# Altium PCB EB1_Spartan_III_1_02.PcbDoc (part 1 of 4)
Units mm, origin at the board's own origin, x right, y up, seen from the top; angles counter-clockwise.
Board outline 165.1 x 115.01 mm, 6 copper layers (Top Layer, MidLayer1, VCC Plane, GND Plane, MidLayer2, Bottom Layer); 356 components, 386 nets, 1788 pads, 779 vias.
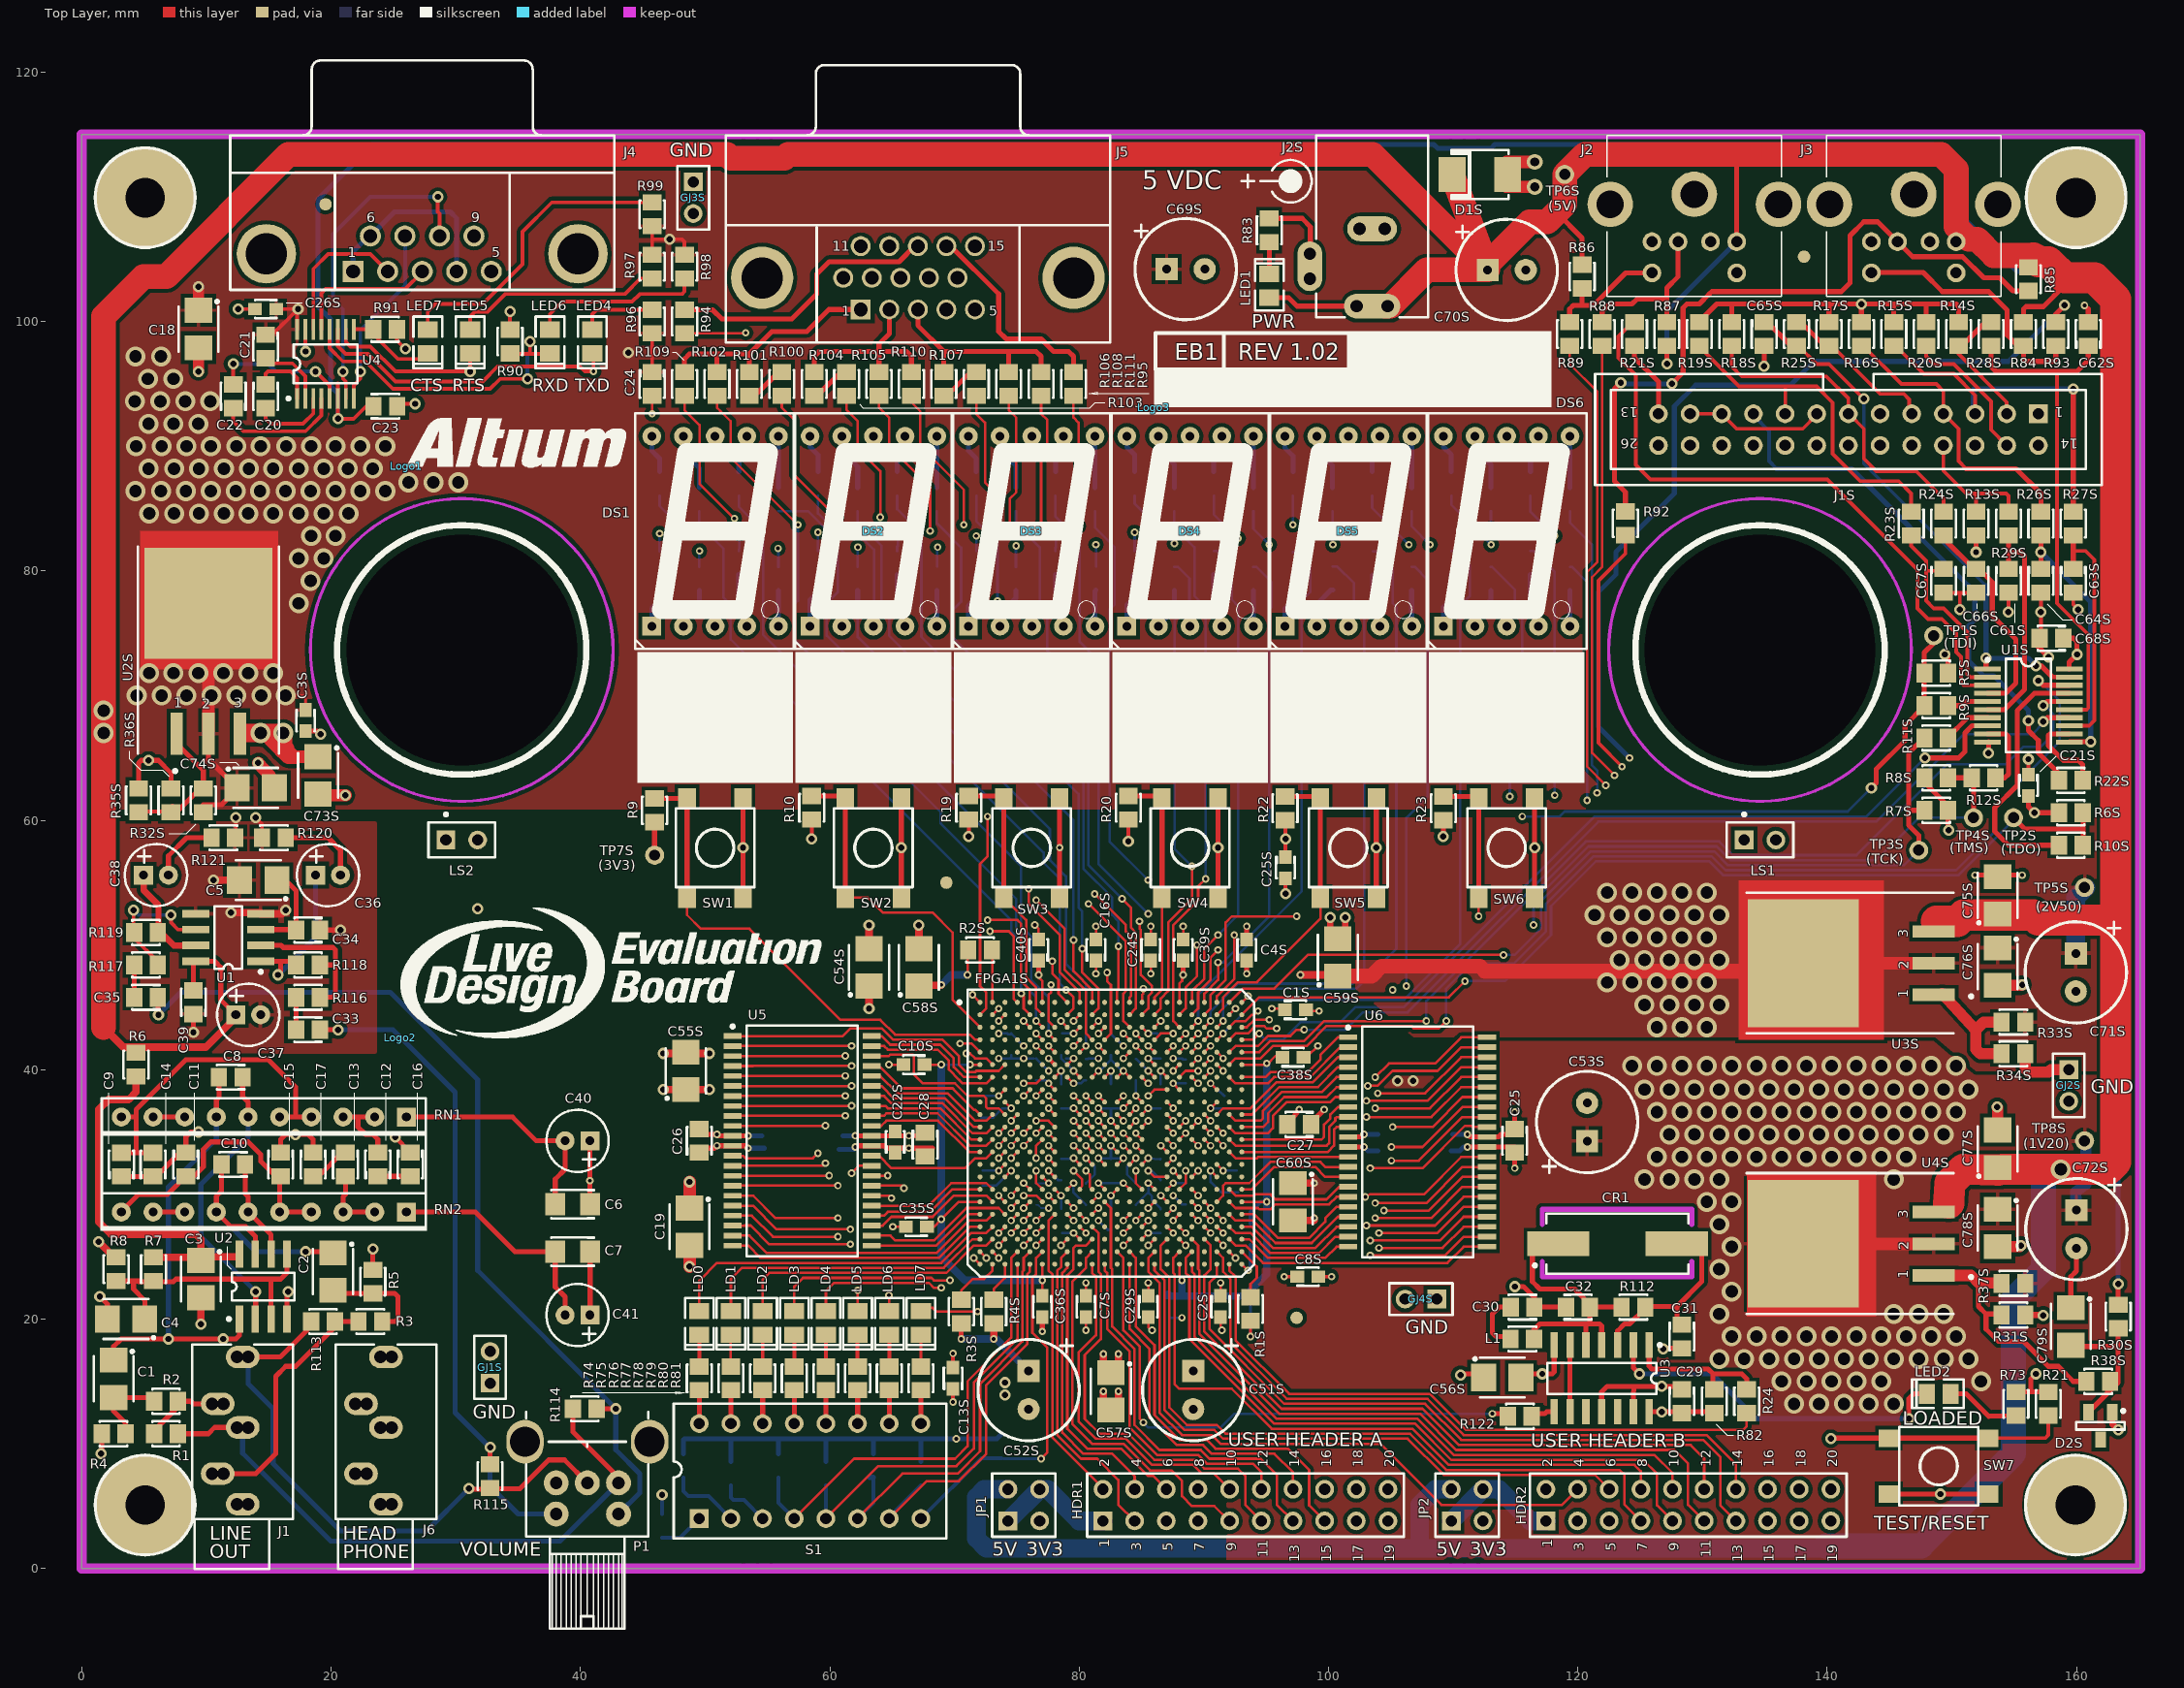
[diagram p0: Top Layer view]
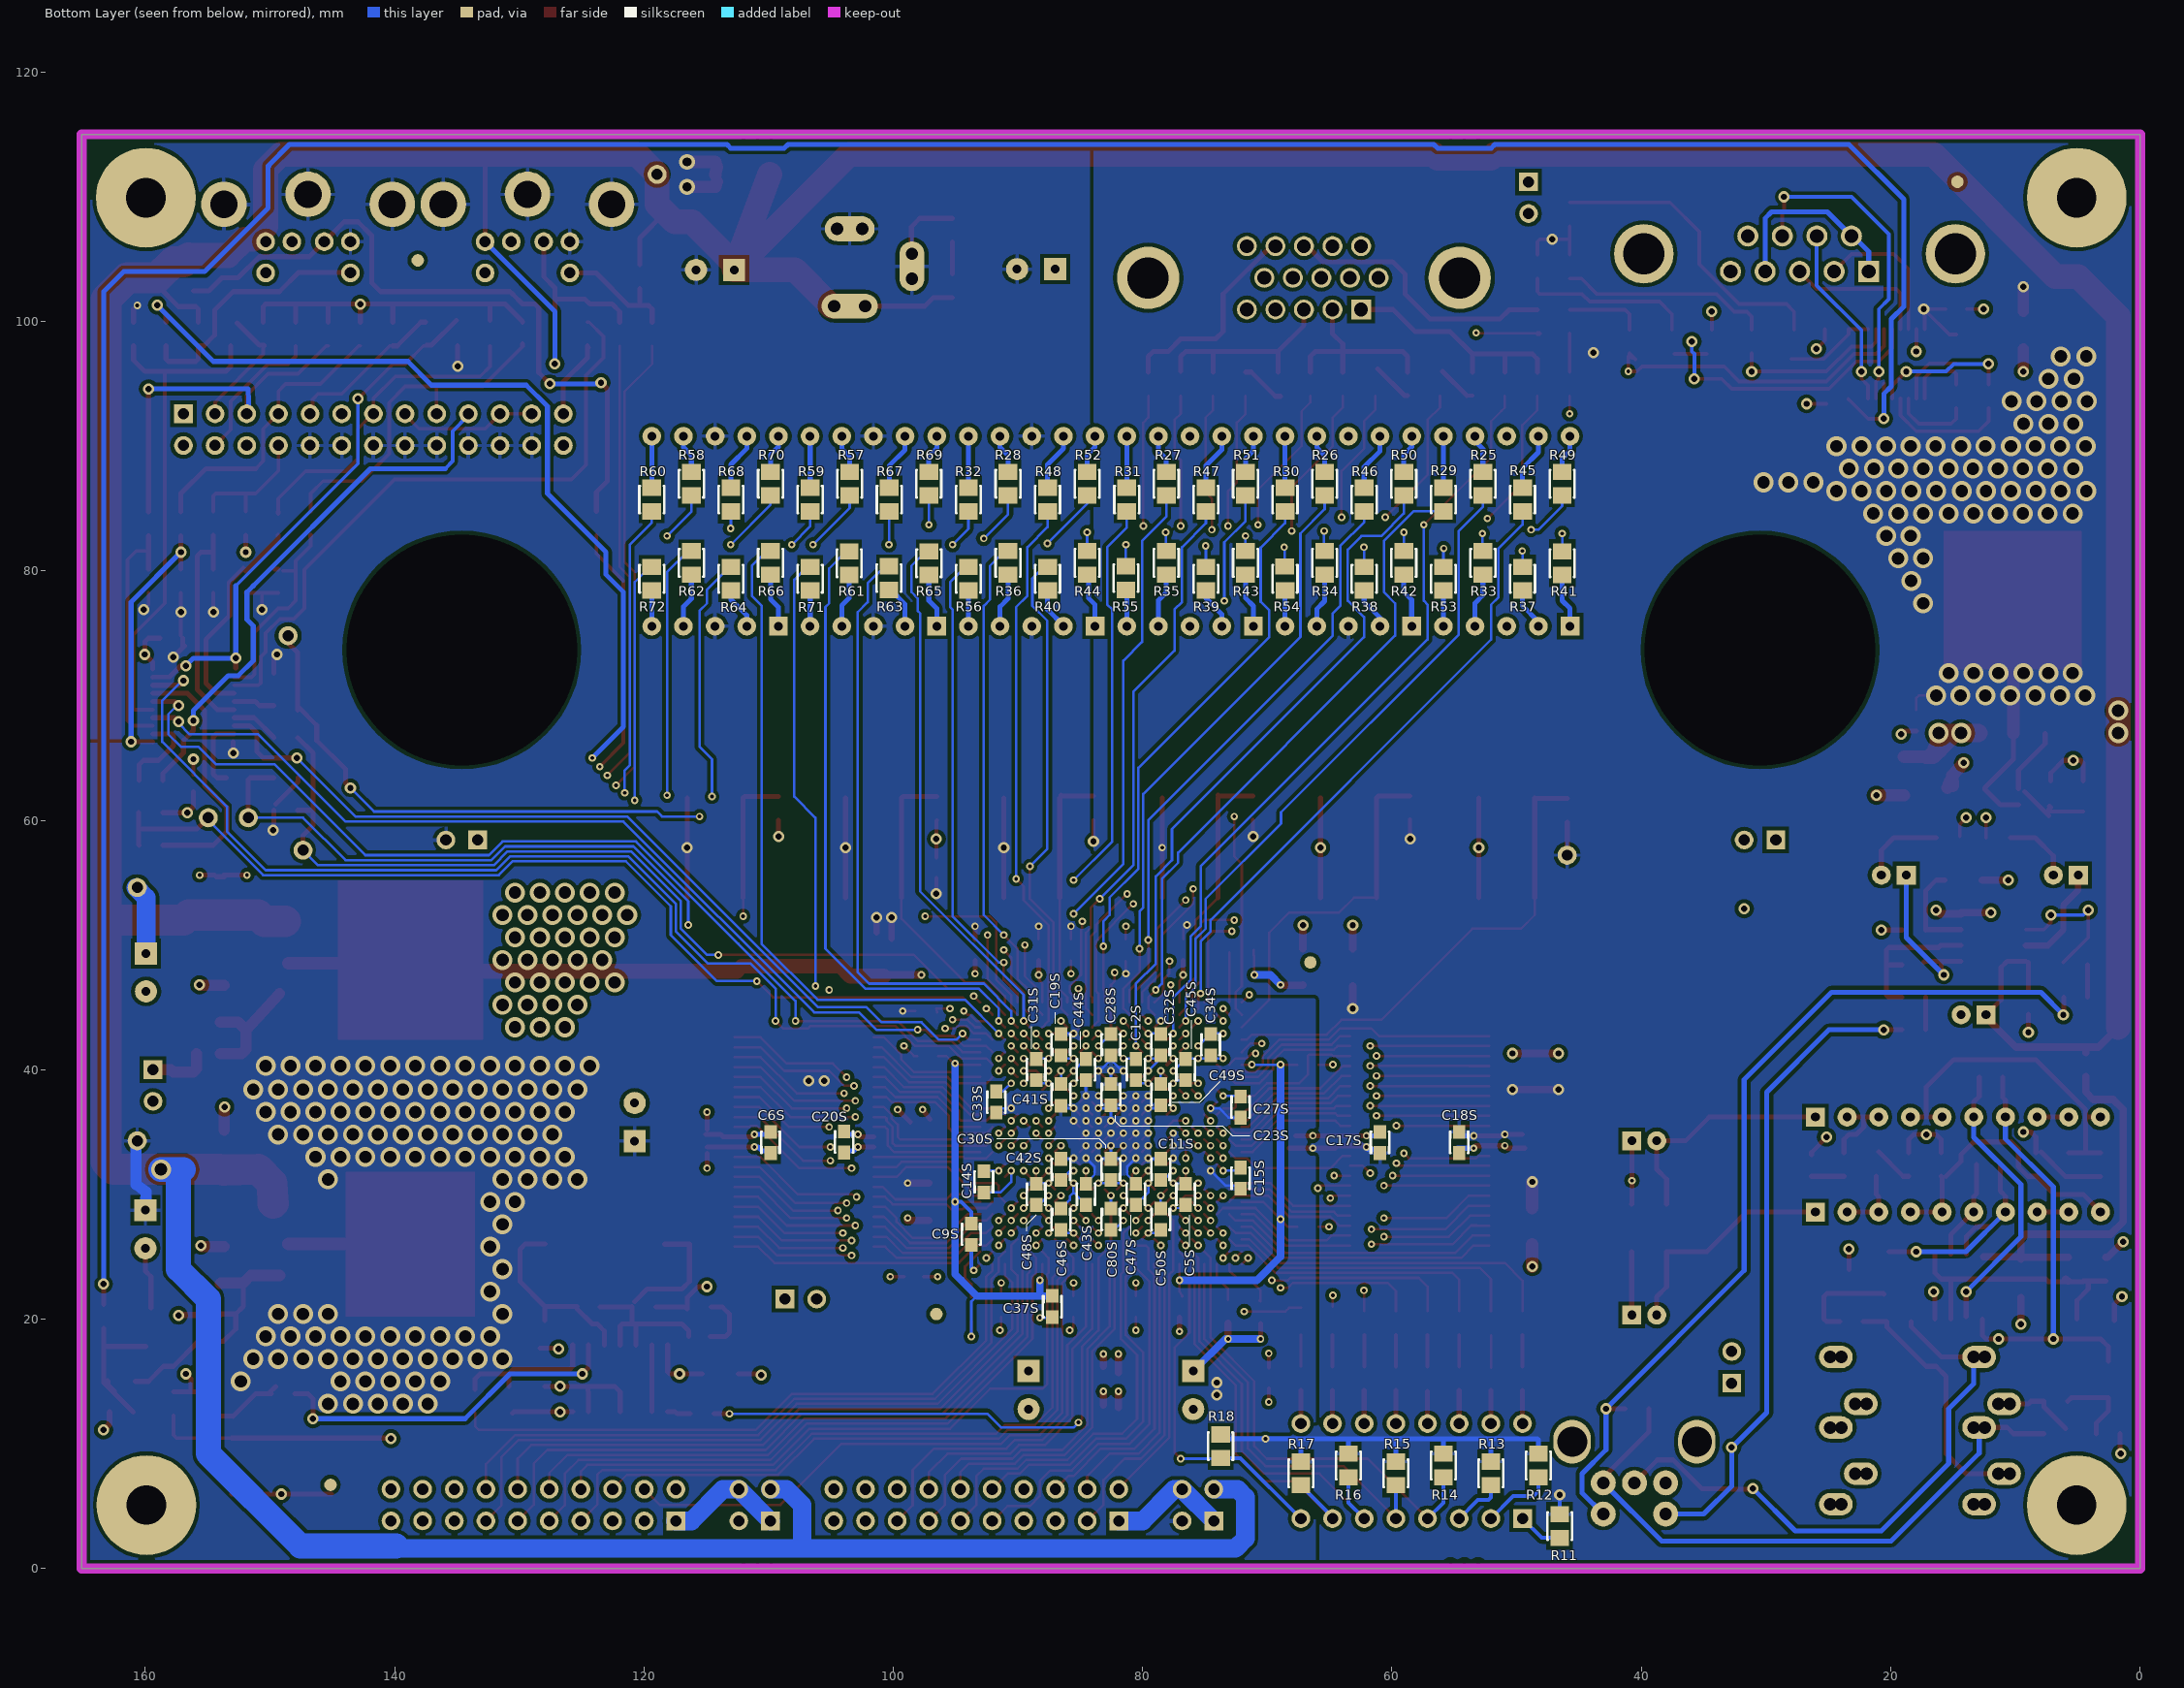
[diagram p1: Bottom Layer view, seen from below]
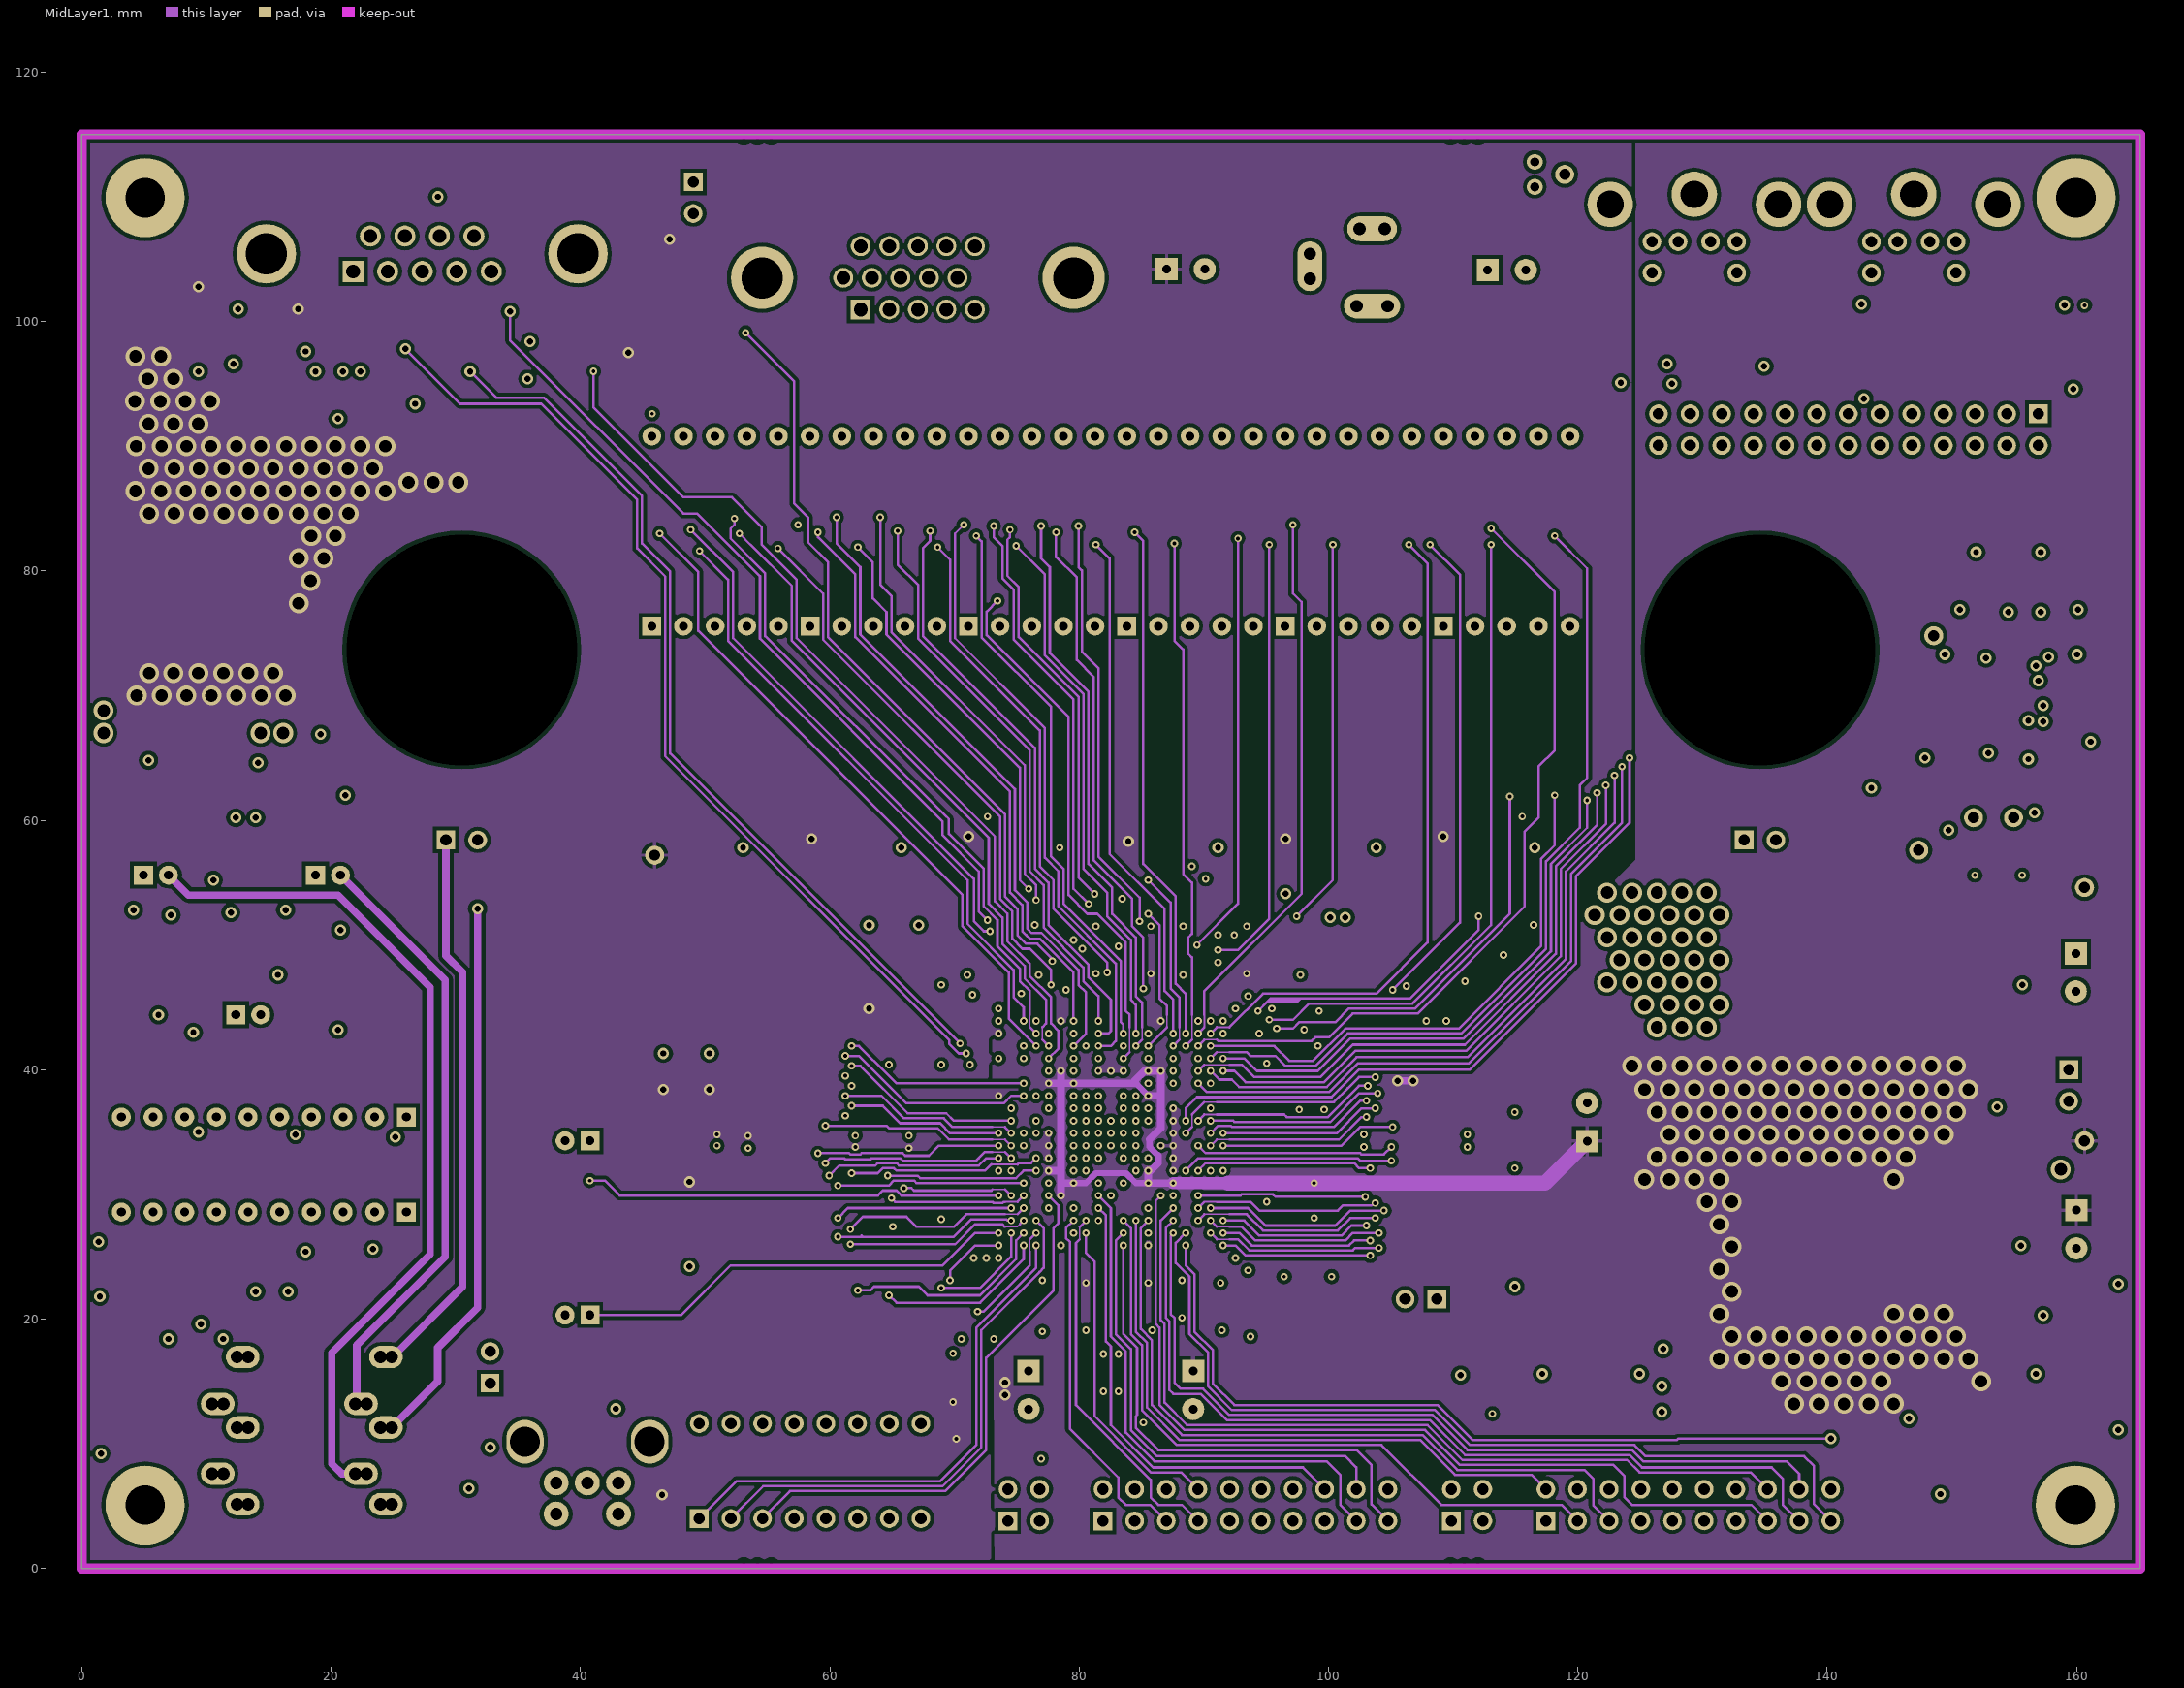
[diagram p2: MidLayer1]
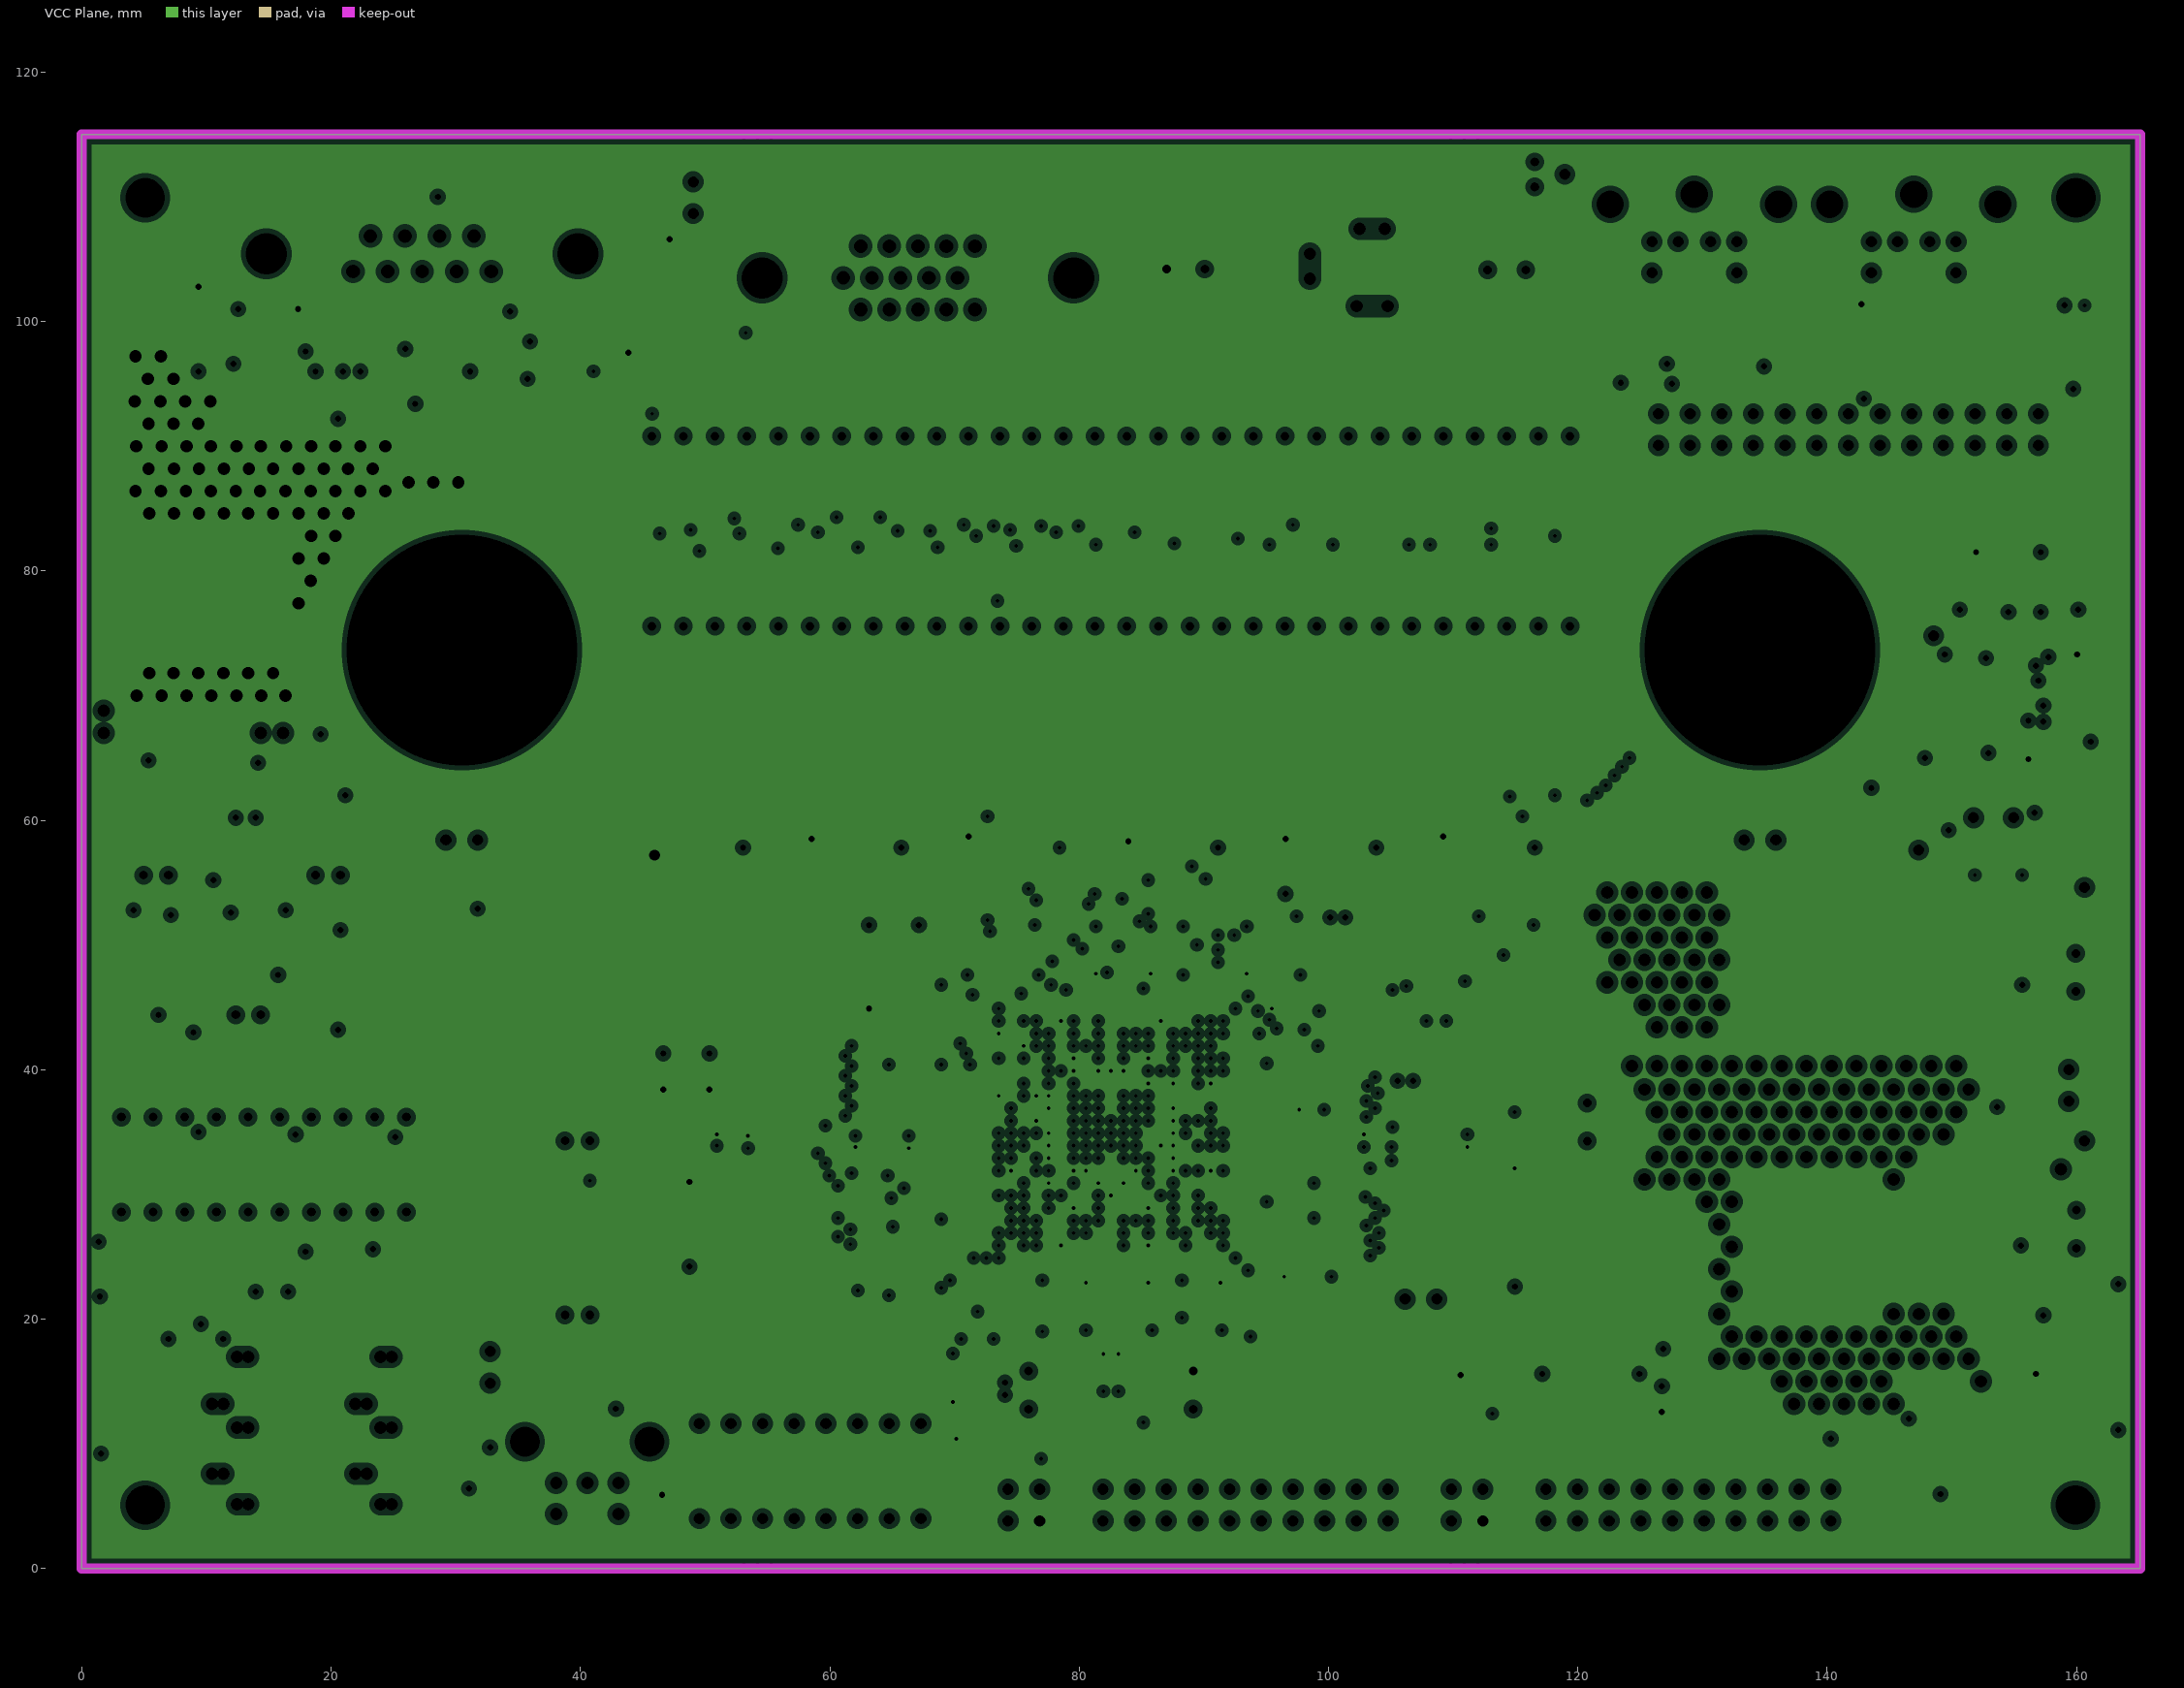
[diagram p3: VCC Plane, clearances drawn from the general rule]
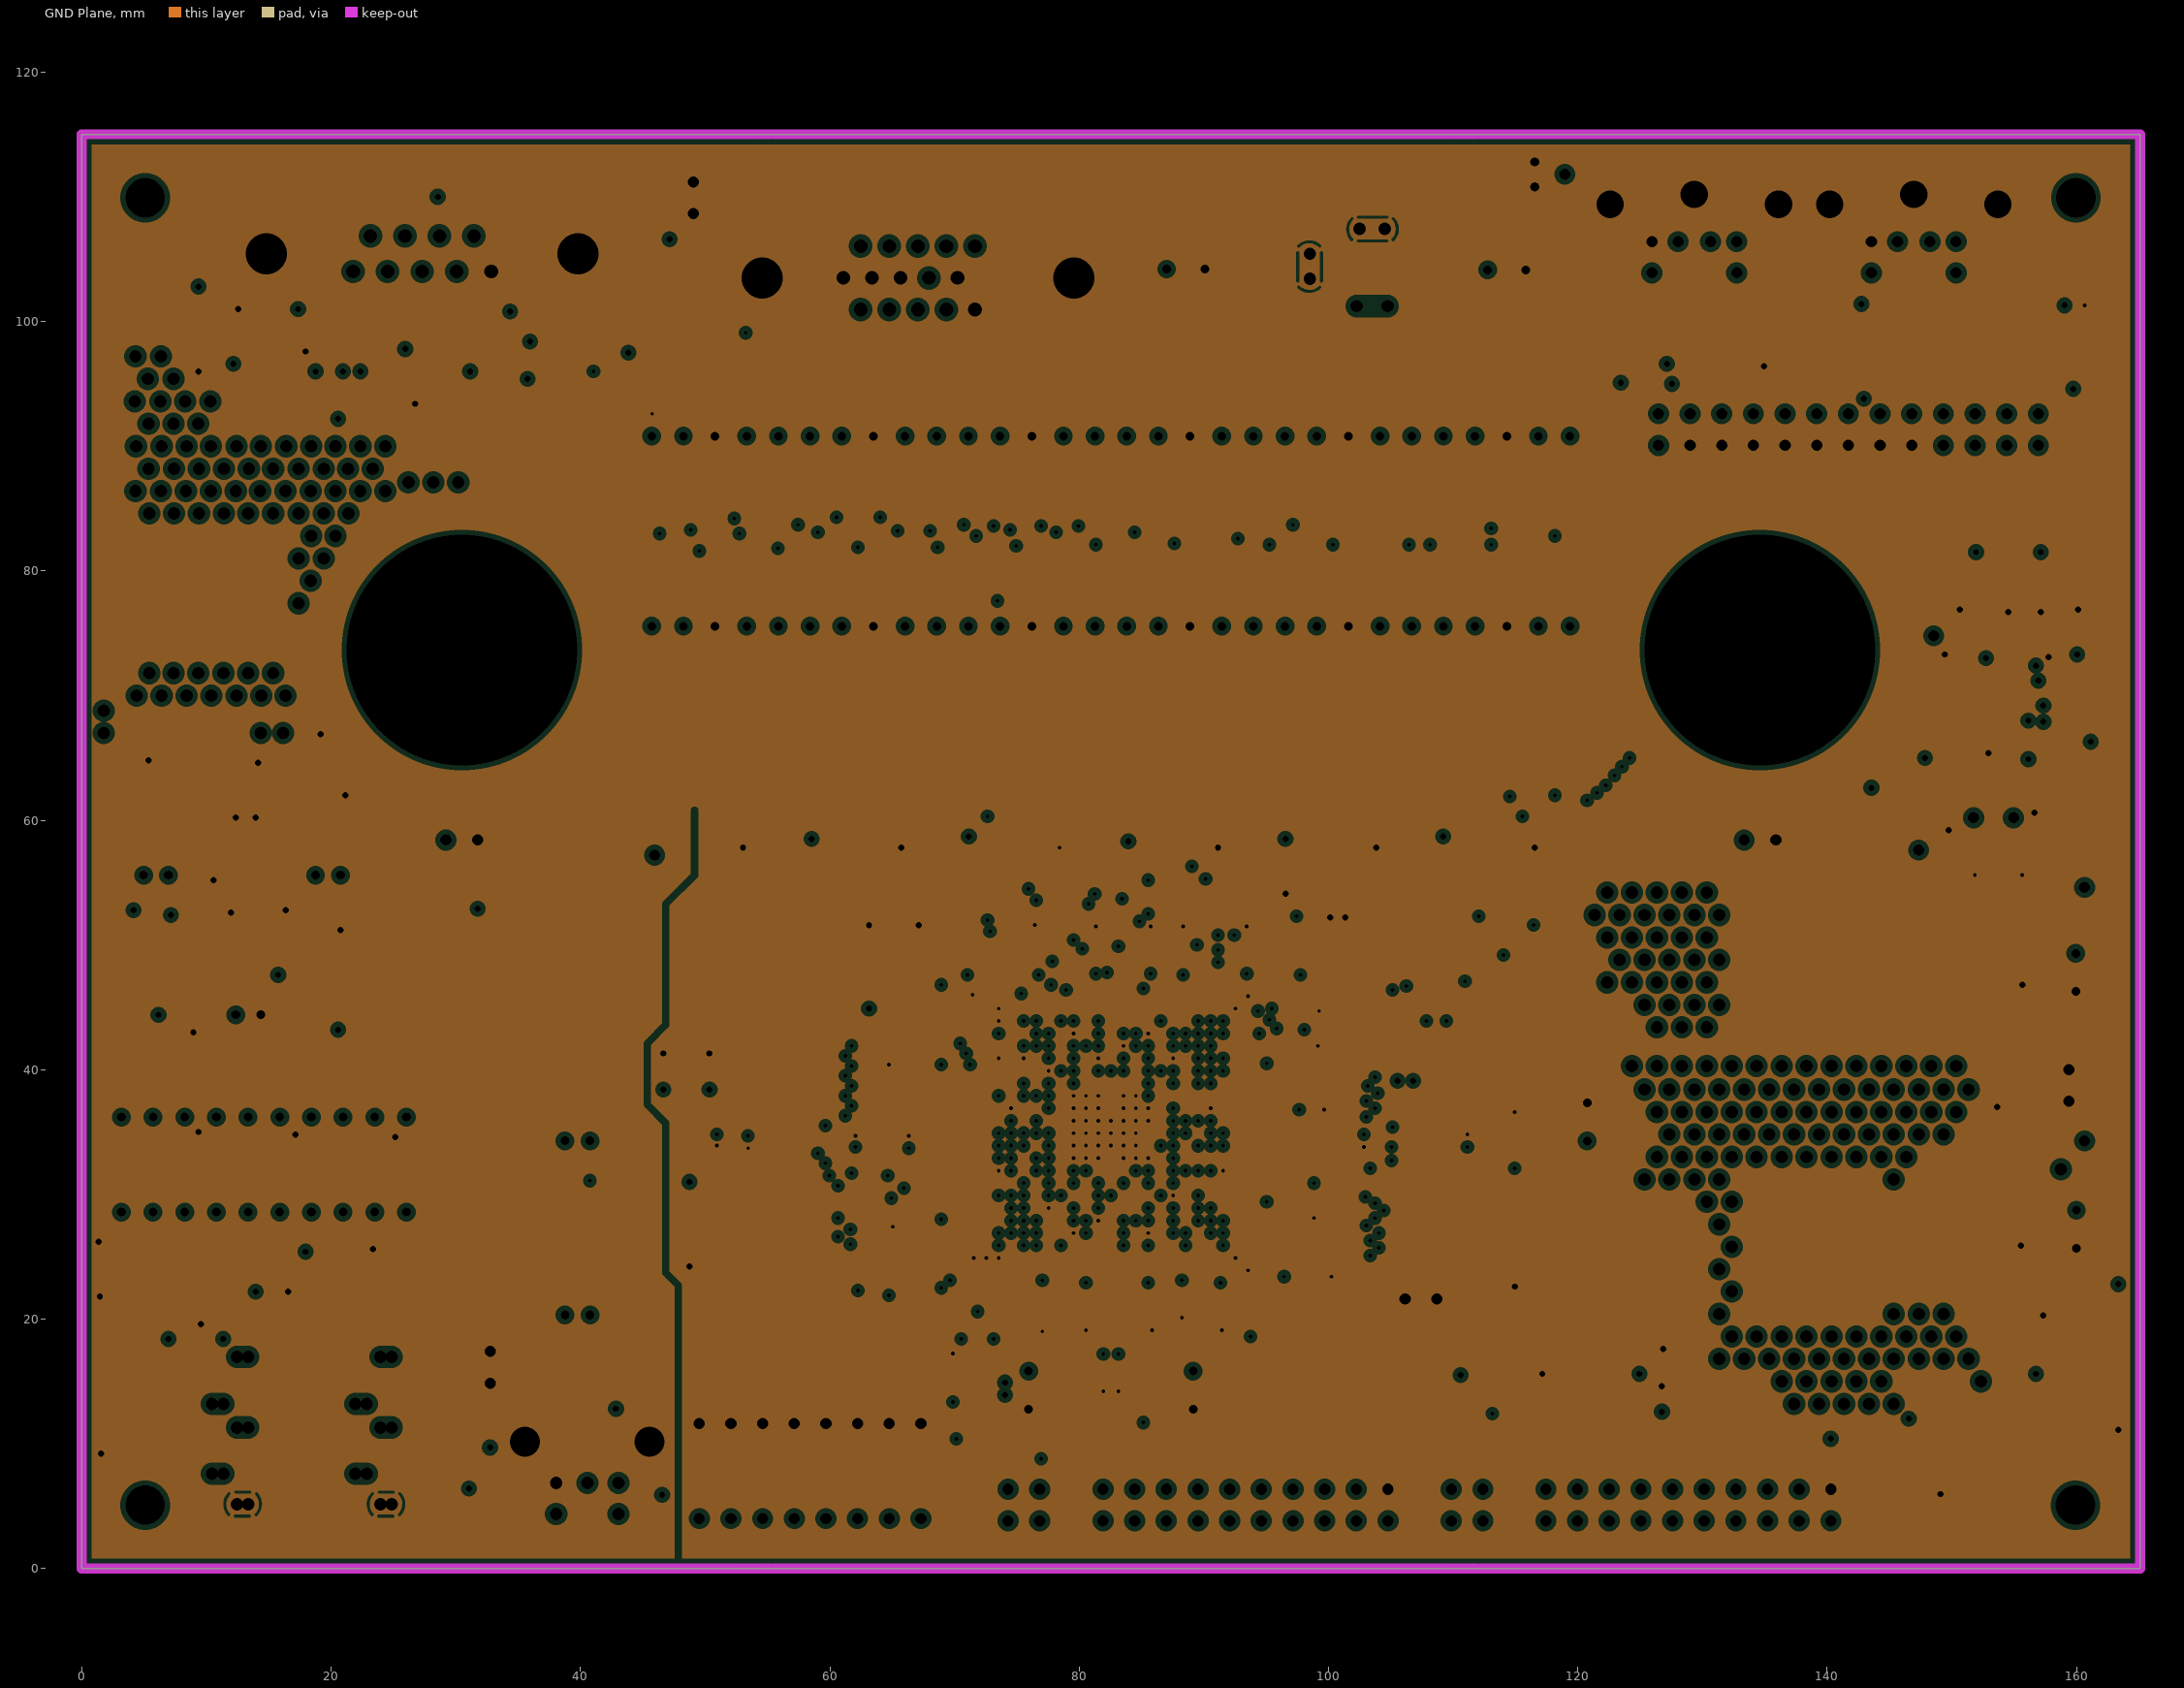
[diagram p4: GND Plane, clearances drawn from the general rule]
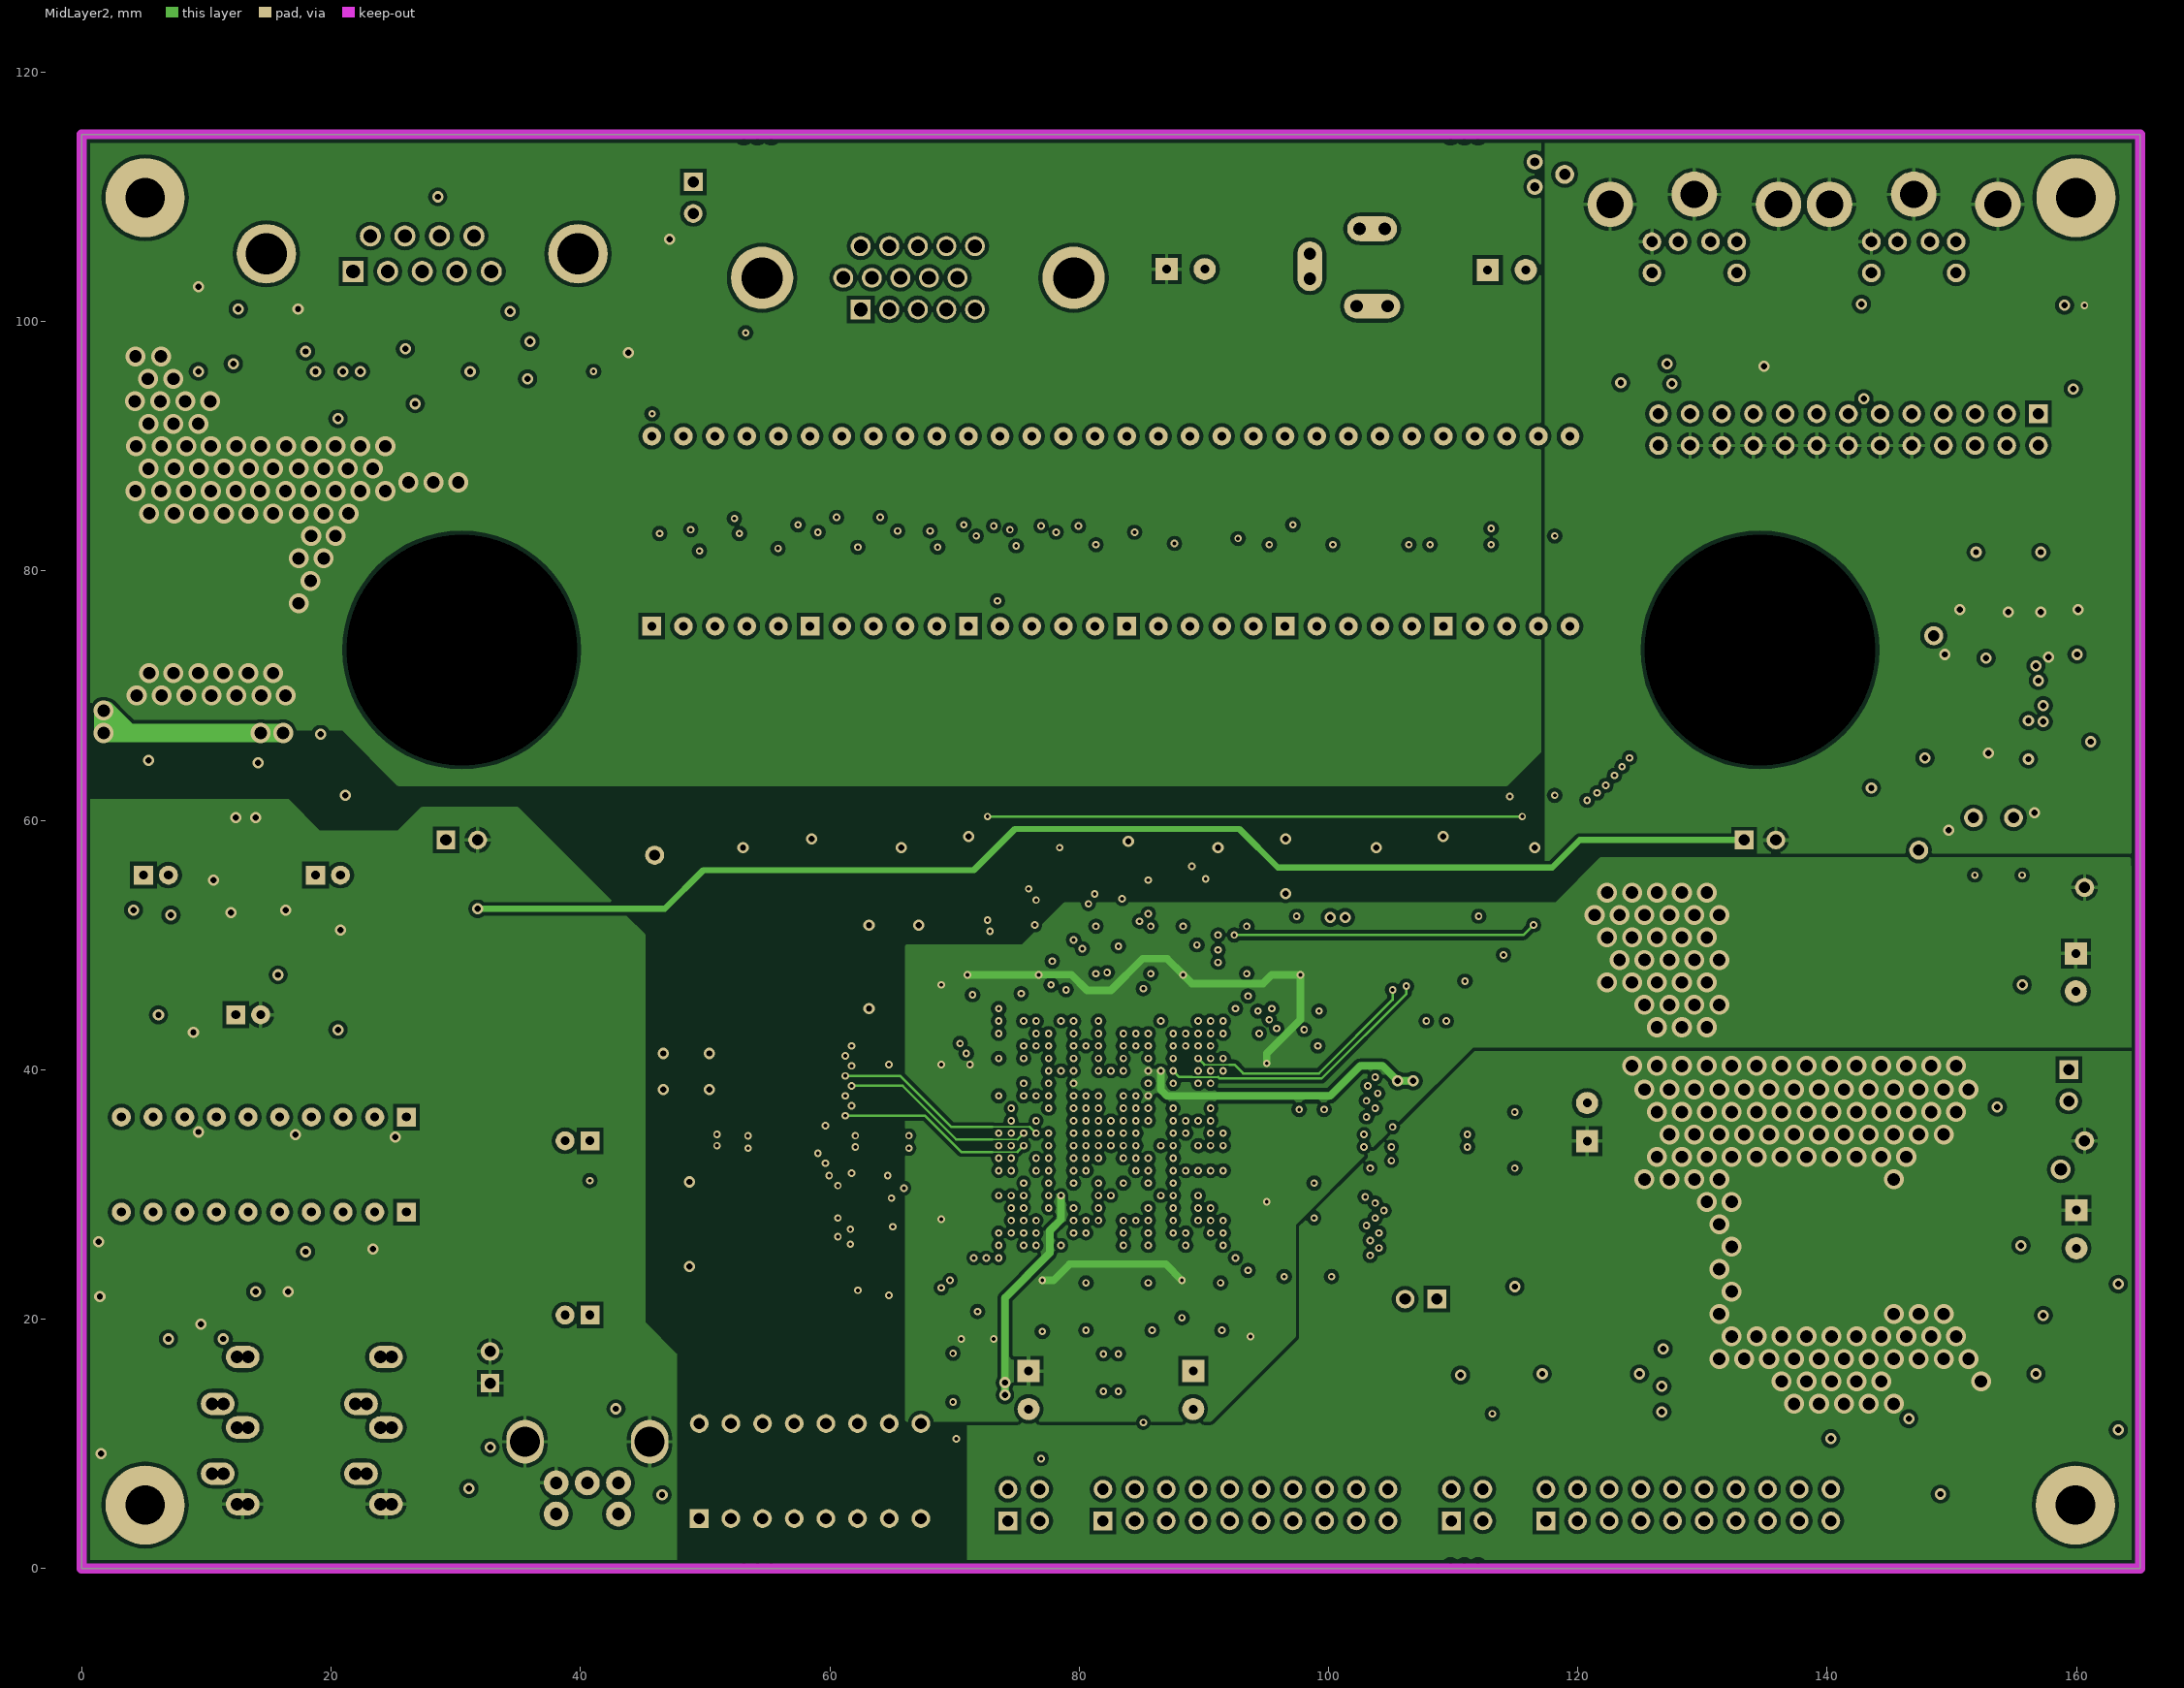
[diagram p5: MidLayer2]

## Layer stack, top to bottom
Top Layer: signal copper 0.0356
Dielectric: core 0.32, FR-4, Dk 4.8
MidLayer1: signal copper 0.0356
Dielectric: prepreg 0.32, FR-4, Dk 4.8
VCC Plane: plane copper 0.0356, net VCC
Dielectric: core 0.32, FR-4, Dk 4.8
GND Plane: plane copper 0.0356, net GND
Dielectric: prepreg 0.32, FR-4, Dk 4.8
MidLayer2: signal copper 0.0356
Dielectric: core 0.32, FR-4, Dk 4.8
Bottom Layer: signal copper 0.0356

## Board outline
0,0 165.1,0 165.1,115.011 0,115.011

## Design rules (kind name [scope] priority, off if disabled: settings)
Clearance Clearance_Breakout_Pads [InPolygon vs IsPad && Name = 'Free-MB'] p1: gap=0.5
Clearance "Fiducial Pad Clearance" [InPadClass('Fiducial Pads')] p2: gap=2
Clearance "Speaker Pad Clearance" [InPadClass('Speaker Cutouts')] p3: gap=3
Clearance Clearance_Polygons [InPolygon] p4: gap=0.3 // Clearance should be 0.35mm
Clearance "InnerLayer Track-Via Clearance" [OnMid And IsTrack vs IsVia] p5: gap=0.127
Clearance Clearance_SSO-G20/P.65 [HasFootprint('SSO-G20/P.65') vs HasFootprint('SSO-G20/P.65')] p6: gap=0.229
Clearance "Via-Via Clearance" [IsVia vs IsVia] p7: gap=0.3
Clearance "Pad-Pad Clearance Same Net" [IsPad And Not (HasFootprint('ST-3150-5N') Or HasFootPrint('KLD-0202')) vs IsPad] p8: gap=0.254
Clearance "Via-Pad Clearance" [IsVia vs IsPad] p9: gap=0.2
Clearance "General Clearance" [All] p10: gap=0.2
ComponentClearance "7 Segment Display Clearance" [HasFootprint('SA/SC56') vs HasFootprint('SA/SC56')] p1: gap=-0.2 collisioncheckmode=3 verticalgap=0.254 showdistances=FALSE
ComponentClearance "SMD LED Clearance" [HasFootprint('SMD _LED') vs HasFootprint('SMD _LED')] p2: gap=0 collisioncheckmode=3 verticalgap=0.254 showdistances=FALSE
ComponentClearance "General ComponentClearance" [All] p3: gap=0.3 collisioncheckmode=3 verticalgap=0.254 showdistances=FALSE
FabricationTestPointUsage TestPointUsage [All] p1 off: valid=0 allowmultiple=FALSE
FabricationTestpoint Testpoint [All] p1 off: side=3 testpointundercomponent=TRUE minsize=1.016 maxsize=2.54 preferedsize=1.524 minholesize=0 maxholesize=1.016 preferedholesize=0.813 testpointgrid=0.025 allowsidetop=TRUE allowsidebottom=TRUE usegrid=TRUE gridtolerance=0
HoleSize HoleSize_Speaker [(InPadClass('Speaker Cutouts'))] p1: absolutevalues=TRUE maxlimit=18.517 minlimit=0 maxpercent=80.000 minpercent=20.000
HoleSize "HoleSize_Audio Jack" [HasFootPrint('ST-3150-5N')] p2: absolutevalues=TRUE maxlimit=2.54 minlimit=0 maxpercent=80.000 minpercent=20.000
HoleSize "HoleSize_Power Connector" [HasFootprint('KLD-0202')] p3: absolutevalues=TRUE maxlimit=2.54 minlimit=0 maxpercent=80.000 minpercent=20.000
HoleSize [All] p4: absolutevalues=TRUE maxlimit=5.2 minlimit=0.25 maxpercent=80.000 minpercent=20.000
PlaneClearance "Speaker Pad Plane Pullback" [InPadClass('Speaker Cutouts')] p1: clearance=3
PlaneClearance [All] p2: clearance=0.4
PlaneConnect PlaneConnect_Vias [IsVia] p1: planeconnectstyle=Direct reliefexpansion=0.508 reliefentries=4 reliefconductorwidth=0.254 reliefairgap=0.254
PlaneConnect PlaneConnect_Obround_Pads [InPadClass('Obround Hole Pads')] p2: planeconnectstyle=Direct reliefexpansion=0.508 reliefentries=4 reliefconductorwidth=0.254 reliefairgap=0.254
PlaneConnect [All] p3: planeconnectstyle=Relief reliefexpansion=0.5 reliefentries=4 reliefconductorwidth=0.25 reliefairgap=0.25
PolygonConnect [All] p1: connectstyle=Relief reliefconductorwidth=0.3 reliefentries=4 polygonreliefangle="90 Angle"
RoutingVias [All] p1: holewidth=0.3 width=0.6 viastyle="Through Hole" minholewidth=0.3 minwidth=0.6 maxholewidth=1.016 maxwidth=1.6
SilkscreenOverComponentPads [All] p1: minsilkscreentomaskgap=0.254
SolderMaskExpansion SolderMaskExpansion_Vias [IsVia] p1: expansion=-0.65
SolderMaskExpansion [All] p2: expansion=0.1
Width [All] p1: maxlimit=2.502 minlimit=0.127 preferedwidth=0.3 toplayer_minwidth=0.2 toplayer_prefwidth=0.4 midlayer1_prefwidth=0.127 midlayer2_prefwidth=0.2 minimp=50.000000 maximp=50.000000 favimp=50.000000
21 further rules are at their usual default settings.

## Classes and differential pairs
component class U_NEB_SRAM: C25 C26 C27 C28 U5 U6
pad class "Fiducial Pads": Free-PSM
net class LED[7..0]: LED0 LED1 LED2 LED3 LED4 LED5 LED6 LED7
net class DIG5_SEG[7..0]: DIG5_SEG0 DIG5_SEG1 DIG5_SEG2 DIG5_SEG3 DIG5_SEG4 DIG5_SEG5 DIG5_SEG6 DIG5_SEG7
net class DIG4_SEG[7..0]: DIG4_SEG0 DIG4_SEG1 DIG4_SEG2 DIG4_SEG3 DIG4_SEG4 DIG4_SEG5 DIG4_SEG6 DIG4_SEG7
net class SW_USER[5..0]: SW_USER0 SW_USER1 SW_USER2 SW_USER3 SW_USER4 SW_USER5
net class SW_DIP[7..0]: SW_DIP0 SW_DIP1 SW_DIP2 SW_DIP3 SW_DIP4 SW_DIP5 SW_DIP6 SW_DIP7
net class SRAM1_D[15..0]: SRAM1_D0 SRAM1_D1 SRAM1_D2 SRAM1_D3 SRAM1_D4 SRAM1_D5 SRAM1_D6 SRAM1_D7 SRAM1_D8 SRAM1_D9 SRAM1_D10 SRAM1_D11 SRAM1_D12 SRAM1_D13 SRAM1_D14 SRAM1_D15
net class SRAM1_A[18..0]: SRAM1_A0 SRAM1_A1 SRAM1_A2 SRAM1_A3 SRAM1_A4 SRAM1_A5 SRAM1_A6 SRAM1_A7 SRAM1_A8 SRAM1_A9 SRAM1_A10 SRAM1_A11 SRAM1_A12 SRAM1_A13 SRAM1_A14 SRAM1_A15 SRAM1_A16 SRAM1_A17 SRAM1_A18
net class SRAM0_D[15..0]: SRAM0_D0 SRAM0_D1 SRAM0_D2 SRAM0_D3 SRAM0_D4 SRAM0_D5 SRAM0_D6 SRAM0_D7 SRAM0_D8 SRAM0_D9 SRAM0_D10 SRAM0_D11 SRAM0_D12 SRAM0_D13 SRAM0_D14 SRAM0_D15
net class SRAM0_A[18..0]: SRAM0_A0 SRAM0_A1 SRAM0_A2 SRAM0_A3 SRAM0_A4 SRAM0_A5 SRAM0_A6 SRAM0_A7 SRAM0_A8 SRAM0_A9 SRAM0_A10 SRAM0_A11 SRAM0_A12 SRAM0_A13 SRAM0_A14 SRAM0_A15 SRAM0_A16 SRAM0_A17 SRAM0_A18
net class RED[2..0]: RED0 RED1 RED2
net class IO[35..0]: IO0 IO1 IO2 IO3 IO4 IO5 IO6 IO7 IO8 IO9 IO10 IO11 IO12 IO13 IO14 IO15 IO16 IO17 IO18 IO19 IO20 IO21 IO22 IO23 IO24 IO25 IO26 IO27 IO28 IO29 IO30 IO31 IO32 IO33 IO34 IO35
net class GREEN[2..0]: GREEN0 GREEN1 GREEN2
net class DIG3_SEG[7..0]: DIG3_SEG0 DIG3_SEG1 DIG3_SEG2 DIG3_SEG3 DIG3_SEG4 DIG3_SEG5 DIG3_SEG6 DIG3_SEG7
net class DIG2_SEG[7..0]: DIG2_SEG0 DIG2_SEG1 DIG2_SEG2 DIG2_SEG3 DIG2_SEG4 DIG2_SEG5 DIG2_SEG6 DIG2_SEG7
net class DIG1_SEG[7..0]: DIG1_SEG0 DIG1_SEG1 DIG1_SEG2 DIG1_SEG3 DIG1_SEG4 DIG1_SEG5 DIG1_SEG6 DIG1_SEG7
net class DIG0_SEG[7..0]: DIG0_SEG0 DIG0_SEG1 DIG0_SEG2 DIG0_SEG3 DIG0_SEG4 DIG0_SEG5 DIG0_SEG6 DIG0_SEG7
net class BLUE[2..0]: BLUE0 BLUE1 BLUE2
component class U_NEB_USRIO: HDR1 HDR2 JP1 JP2
component class U_NEB_PSU: C69S C70S C71S C72S C73S C74S C75S C76S C77S C78S C79S D1S D2S GJ1S GJ2S GJ3S GJ4S J2S R30S R31S R32S R33S R34S R35S R36S R37S R38S TP5S TP6S TP7S TP8S U2S U3S U4S
component class U_NEB_PCIO: C18 C19 C20 C21 C22 C23 C24 J2 J3 J4 J5 LED4 LED5 LED6 LED7 R84 R85 R86 R87 R88 R89 R90 R91 R92 R93 R94 R95 R96 R97 R98 R99 R100 R101 R102 R103 R104 R105 R106 R107 R108 R109 R110 R111 U4
component class U_NEB_LED_KEY: DS1 DS2 DS3 DS4 DS5 DS6 L0 L2 L3 L4 L5 L6 L7 LD0 LD1 LD2 LD3 LD4 LD5 LD6 LD7 LED1 LED2 R9 R10 R11 R12 R13 R14 R15 R16 R17 R18 R19 R20 R21 R22 R23 R24 R25 R26 R27 R28 R29 R30 R31 R32 R33 R34 R35 R36 R37 R38 R39 R40 R41 R42 R43 R44 R45 R46 R47 R48 R49 R50 R51 R52 R53 R54 R55 R56 R57 R58 R59 R60 R61 R62 R63 R64 R65 R66 R67 R68 R69 R70 R71 R72 R73 R74 R75 R76 R77 R78 R79 R80 R81 R82 R83 S1 SW1 SW2 SW3 SW4 SW5 SW6 SW7 U3
component class U_NEB_JTAG_INT: C61S C62S C63S C64S C65S C66S C67S C68S J1S R13S R14S R15S R16S R17S R18S R19S R20S R21S R22S R23S R24S R25S R26S R27S R28S R29S U1S
component class U_NEB_AUDIO_OUT: C1 C2 C3 C4 C5 C6 C7 C8 C9 C10 C11 C12 C13 C14 C15 C16 C17 C33 C34 C35 C36 C37 C38 C39 C40 C41 J1 J6 LS1 LS2 LS3 LS4 P1 R1 R2 R3 R4 R5 R6 R7 R8 R113 R114 R115 R116 R117 R118 R119 R120 R121 RN1 RN2 SPKR1 U1 U2
component class U_FPGA: C1S C2S C3S C4S C5S C6S C7S C8S C9S C10S C11S C12S C13S C14S C15S C16S C17S C18S C19S C20S C21S C22S C23S C24S C25S C26S C27S C28S C29S C30S C31S C32S C33S C34S C35S C36S C37S C38S C39S C40S C41S C42S C43S C44S C45S C46S C47S C48S C49S C50S C51S C52S C53S C54S C55S C56S C57S C58S C59S C60S C80S FPGA1S R1S R2S R3S R4S R5S R6S R7S R8S R9S R10S R11S R12S TP1S TP2S TP3S TP4S
pad class "Speaker Cutouts": Free-H-SPK2 Free-H_SPK1
pad class "Obround Hole Pads": J1-1 J1-1A J1-1B J1-2 J1-2A J1-2B J1-3 J1-3A J1-3B J1-4 J1-4A J1-4B J1-5 J1-5A J1-5B J2S-1 J2S-1A J2S-1B J2S-2 J2S-2A J2S-2B J2S-3 J2S-3A J2S-3B J6-1 J6-1A J6-1B J6-2 J6-2A J6-2B J6-3 J6-3A J6-3B J6-4 J6-4A J6-4B J6-5 J6-5A J6-5B

## Components (designator, comment, footprint, x,y, rotation, side; value= is the part's Value field where it differs from the comment)
C1 "10uF" MCCT-B#1 2.55,15.2 r270 top
C1S "220nF" CC1608-0603#1 97.35,44.8 r0 top
C2 "10uF" MCCT-B#1 20.15,23.8 r270 top
C2S "220nF" CC1608-0603#1 91.35,21 r270 top
C3 "10uF" MCCT-B#1 9.55,23.2 r270 top
C3S "220nF" CC1608-0603#1 17.95,68 r270 top
C4 "10uF" MCCT-B#1 3.55,20 r180 top
C4S "220nF" CC1608-0603#1 93.45,49.6 r90 top
C5 "10uF" MCCT-B#1 14.15,55.2 r180 top
C5S "220nF" CC1608-0603#1 76.55,30 r270 bottom
C6 "1uF" CC3216-1206 39.37,29.21 r180 top
C6S "220nF" CC1608-0603#1 109.855,34.163 r90 bottom
C7 "1uF" CC3216-1206 39.37,25.4 r180 top
C7S "220nF" CC1608-0603#1 80.55,21 r270 top
C8 "470pF" CC2012-0805 11.95,39.4 r180 top
C8S "220nF" CC1608-0603#1 98.35,23.4 r0 top
C9 "470pF" CC2012-0805 3.175,32.385 r90 top
C9S "220nF" CC1608-0603#1 93.75,26.8 r270 bottom
C10 "470pF" CC2012-0805 12.15,32.4 r180 top
C10S "220nF" CC1608-0603#1 66.75,40.4 r180 top
C11 "470pF" CC2012-0805 8.35,32.4 r270 top
C11S "220nF" CC1608-0603#1 78.55,32 r90 bottom
C12 "6.8nF" CC2012-0805 23.75,32.4 r90 top
C12S "220nF" CC1608-0603#1 80.55,40 r90 bottom
C13 "6.8nF" CC2012-0805 21.15,32.4 r270 top
C13S "10nF" CC1608-0603#1 69.885,15.245 r90 top
C14 "4.7nF" CC2012-0805 5.715,32.385 r90 top
C14S "10nF" CC1608-0603#1 92.75,31 r90 bottom
C15 "4.7nF" CC2012-0805 15.95,32.4 r270 top
C15S "10nF" CC1608-0603#1 72.15,31.3 r90 bottom
C16 "47nF" CC2012-0805 26.35,32.4 r270 top
C16S "10nF" CC1608-0603#1 81.35,49.6 r90 top
C17 "47nF" CC2012-0805 18.55,32.4 r270 top
C17S "10nF" CC1608-0603#1 60.96,34.163 r90 bottom
C18 "10uF" MCCT-B#1 9.35,99.4 r270 top
C18S "10nF" CC1608-0603#1 54.61,34.163 r270 bottom
C19 "10uF" MCCT-B#1 48.75,27.4 r270 top
C19S "10nF" CC1608-0603#1 86.55,42 r90 bottom
C20 "100nF" CC2012-0805 14.75,94 r270 top
C20S "10nF" CC1608-0603#1 103.95,34.2 r270 bottom
C21 "100nF" CC2012-0805 14.75,98 r270 top
C21S "10nF" CC1608-0603#1 156.15,62.8 r270 top
C22 "100nF" CC2012-0805 12.15,94 r90 top
C22S "10nF" CC1608-0603#1 65.25,34.2 r90 top
C23 "100nF" CC2012-0805 24.35,93.2 r0 top
C23S "10nF" CC1608-0603#1 82.55,38 r270 bottom
C24 "100nF" CC2012-0805 45.75,95 r270 top
C24S "10nF" CC1608-0603#1 85.75,49.6 r90 top
C25 "220nF" CC2012-0805 114.935,34.29 r270 top
C25S "10nF" CC1608-0603#1 96.55,56.2 r270 top
C26 "220nF" CC2012-0805 49.53,34.29 r90 top
C26S "10nF" CC1608-0603#1 14.75,101 r180 top
C27 "10nF" CC2012-0805 97.65,35.6 r180 top
C27S "10nF" CC1608-0603#1 72.15,37 r270 bottom
C28 "10nF" CC2012-0805 67.65,34 r270 top
C28S "10nF" CC1608-0603#1 82.55,42 r90 bottom
C29 "10nF" CC2012-0805 128.35,13.4 r270 top
C29S "10nF" CC1608-0603#1 85.55,21 r270 top
C30 "1nF/NPO" CC2012-0805 115.57,20.955 r180 top
C30S "10nF" CC1608-0603#1 82.55,32 r90 bottom
C31 "15pF/NPO" CC2012-0805 128.35,18.6 r270 top
C31S "10nF" CC1608-0603#1 88.55,40 r90 bottom
C32 "15pF/NPO" CC2012-0805 120.015,20.955 r0 top
C32S "10nF" CC1608-0603#1 78.55,42 r90 bottom
C33 "0.1uF" CC2012-0805 18.15,43.2 r180 top
C33S "10nF" CC1608-0603#1 91.75,37.4 r270 bottom
C34 "0.1uF" CC2012-0805 18.15,51.2 r180 top
C34S "10nF" CC1608-0603#1 74.55,42 r270 bottom
C35 "0.1uF" CC2012-0805 5.15,45.8 r180 top
C35S "10nF" CC1608-0603#1 66.95,27.4 r180 top
C36 "100uF/10V" "CAP D5MM/P2MM" 18.75,55.6 r0 top
C36S "10nF" CC1608-0603#1 77.05,21 r270 top
C37 "100uF/10V" "CAP D5MM/P2MM" 12.35,44.4 r0 top
C37S "10nF" CC1608-0603#1 87.25,21 r270 bottom
C38 "100uF/10V" "CAP D5MM/P2MM" 4.95,55.6 r0 top
C38S "10nF" CC1608-0603#1 97.15,41 r0 top
C39 "0.1uF" CC2012-0805 8.95,45.4 r90 top
C39S "10nF" CC1608-0603#1 88.35,49.6 r90 top
C40 "2.2uF/50V/Bip" "CAP D5mm/P2mm" 40.767,34.29 r180 top
C40S "10nF" CC1608-0603#1 76.75,49.6 r90 top
C41 "2.2uF/50V/Bip" "CAP D5mm/P2mm" 40.767,20.32 r180 top
C41S "10nF" CC1608-0603#2 86.55,38 r270 bottom
C42S "10nF" CC1608-0603#1 86.55,32 r90 bottom
C43S "10nF" CC1608-0603#1 84.55,30 r90 bottom
C44S "220nF" CC1608-0603#1 84.55,40 r270 bottom
C45S "10nF" CC1608-0603#1 76.55,40 r90 bottom
C46S "10nF" CC1608-0603#1 86.55,28 r270 bottom
C47S "10nF" CC1608-0603#1 80.55,30 r90 bottom
C48S "220nF" CC1608-0603#1 88.55,30 r270 bottom
C49S "10nF" CC1608-0603#1 78.55,38 r270 bottom
C50S "10nF" CC1608-0603#1 78.55,28 r270 bottom
C51S "470uF 16V" RB8/3.5 89.15,14.3 r0 top
C52S "470uF 16V" RB8/3.5 75.95,14.3 r0 top
C53S "470uF 16V" RB8/3.5 120.75,35.8 r180 top
C54S "10uF" MCCT-B#1 63.15,48.2 r90 top
C55S "10uF" MCCT-B#1 48.45,39.9 r90 top
C56S "10uF" MCCT-B#1 113.95,15.3 r0 top
C57S "10uF" MCCT-B#1 82.55,14.2 r270 top
C58S "10uF" MCCT-B#1 67.15,48.2 r90 top
C59S "10uF" MCCT-B#1 100.75,49 r90 top
C60S "10uF" MCCT-B#2 97.15,29.4 r270 top
C61S "47pF" CC2012-0805 154.55,79.2 r270 top
C62S "47pF" CC2012-0805 160.95,99 r90 top
C63S "47pF" CC2012-0805 159.75,79.2 r270 top
C64S "47pF" CC2012-0805 157.15,79.2 r270 top
C65S "47pF" CC2012-0805 134.95,99 r270 top
C66S "47pF" CC2012-0805 151.95,79.2 r270 top
C67S "47pF" CC2012-0805 149.35,79.2 r270 top
C68S "100nF" CC2012-0805 158,74.6 r180 top
C69S "470uF 16V" RB8/3.5 88.55,104.2 r90 top
C70S "470uF 16V" RB8/3.5 114.3,104.14 r90 top
C71S "470uF 16V" RB8/3.5 159.95,47.8 r0 top
C72S "470uF 16V" RB8/3.5 160,27.2 r0 top
C73S "10uF" MCCT-B#1 18.95,63.6 r270 top
C74S "10uF" MCCT-B#1 13.95,62.6 r0 top
C75S "10uF" MCCT-B#1 153.67,53.975 r90 top
C76S "10uF" MCCT-B#1 153.67,48.26 r270 top
C77S "10uF" MCCT-B#1 153.67,33.655 r90 top
C78S "10uF" MCCT-B#1 153.67,27.305 r270 top
C79S "10uF" MCCT-B#1 159.55,19.4 r270 top
C80S "220nF" CC1608-0603#1 82.55,28 r270 bottom
CR1 "50MHz QC49/SMD" QC49/SMD 123.19,26.035 r0 top
D1S "SMBJ5341B" DO214 112.15,111.8 r180 top
D2S "BAS40-04" SO-G3 161.925,11.43 r180 top
DS1 "HDSP-513A" SA/SC56 45.72,75.565 r0 top locked
DS2 "HDSP-513A" SA/SC56 58.42,75.565 r0 top locked
DS3 "HDSP-513A" SA/SC56 71.12,75.565 r0 top locked
DS4 "HDSP-513A" SA/SC56 83.82,75.565 r0 top locked
DS5 "HDSP-513A" SA/SC56 96.52,75.565 r0 top locked
DS6 "HDSP-513A" SA/SC56 109.22,75.565 r0 top locked
FPGA1S "XC3S400-5FG456C" FG456 82.55,34.9 r0 top
GJ1S "Header 2" HDR1X2 32.75,14.86 r90 top
GJ2S "Header 2" HDR1X2 159.385,40.005 r270 top
GJ3S "Header 2" HDR1X2 49.05,111.2 r270 top
GJ4S "Header 2" HDR1X2 108.69,21.6 r180 top
HDR1 "Header 10X2" HDR2X10 81.915,3.81 r0 top locked
HDR2 "Header 10X2" HDR2X10 117.44,3.81 r0 top locked
J1 "ST-3150-5N" ST-3150-5N 12.05,-0.05 r180 top
J1S "70246-2622" HDR2X13_CEN_LP 156.95,92.6 r180 top
J2 "MDJ-F-06" MDJ-F-06 129.35,114.9 r270 top
J2S "KLD-0202-B" KLD-0202 103.505,114.935 r270 top locked
J3 "MDJ-F-06" MDJ-F-06 146.95,114.9 r270 top
J4 "DB9 Female" DSUB1.385-2H9 27.305,114.935 r0 top locked
J5 "Dsub-15-Female-HD" DB15-VGA-Female 62.484,100.965 r0 top locked
J6 "ST-3150-5N" ST-3150-5N 23.55,-0.05 r180 top
JP1 "Header 2X2" HDR2X2_B 74.295,3.81 r0 top locked
JP2 "Header 2X2" HDR2X2_B 109.855,3.81 r0 top locked
L1 "470nH" CR2012-0805#1 115.55,18.4 r180 top
LD0 "HSMH-C170" "SMD _LED" 49.53,19.685 r90 top
LD1 "HSMH-C170" "SMD _LED" 52.07,19.685 r90 top
LD2 "HSMH-C170" "SMD _LED" 54.61,19.685 r90 top
LD3 "HSMH-C170" "SMD _LED" 57.15,19.685 r90 top
LD4 "HSMH-C170" "SMD _LED" 59.69,19.685 r90 top
LD5 "HSMH-C170" "SMD _LED" 62.23,19.685 r90 top
LD6 "HSMH-C170" "SMD _LED" 64.77,19.685 r90 top
LD7 "HSMH-C170" "SMD _LED" 67.31,19.685 r90 top
LED1 "HSMH-C170" "SMD _LED" 95.25,102.87 r270 top
LED2 "HSMG-C170" "SMD _LED" 148.95,14 r0 top
LED4 "HSMH-C170" "SMD _LED" 40.95,98.4 r90 top
LED5 "HSMH-C170" "SMD _LED" 31.15,98.4 r90 top
LED6 "HSMH-C170" "SMD _LED" 37.55,98.4 r90 top
LED7 "HSMH-C170" "SMD _LED" 27.75,98.4 r90 top
Logo1 "Altium" Altium 26.054,88.411 r0 top
Logo2 "Live Design Evaluation Board" "Live Design Evaluation Board" 25.546,42.564 r0 top
Logo3 "Serial Number Area" "Serial Number" 85.998,93.11 r0 top
LS1 "Speaker" PIN2 133.35,58.42 r0 top
LS2 "Speaker" PIN2 29.21,58.42 r0 top
P1 "R09A12V01-A502-15E (2x5k log)" R09A12V01-E 40.55,10.16 r0 top
R1 "10R" CR2012-0805#1 6.75,10.8 r0 top
R1S "4k7" CR2012-0805#1 93.75,20.8 r90 top
R2 "68R" CR2012-0805#1 6.75,13.4 r0 top
R2S "4k7" CR2012-0805#1 72.05,49.6 r0 top
R3 "68R" CR2012-0805#1 23.15,19.8 r180 top
R3S "4k7" CR2012-0805#1 70.55,20.6 r90 top
R4 "100k" CR2012-0805#1 2.55,10.8 r180 top
R4S "4k7" CR2012-0805#1 73.15,20.6 r90 top
R5 "100k" CR2012-0805#1 23.35,23 r90 top
R5S "4k7" CR2012-0805#1 148.75,71.8 r180 top
R6 "10R" CR2012-0805#1 4.35,40.4 r90 top
R6S "4k7" CR2012-0805#1 159.55,60.6 r0 top
R7 "6K8" CR2012-0805#1 5.75,24 r270 top
R7S "4k7" CR2012-0805#1 148.75,60.8 r180 top
R8 "6K8" CR2012-0805#1 2.75,24 r90 top
R8S "4k7" CR2012-0805#1 148.75,63.4 r0 top
R9 "4k7" CR2012-0805#1 45.95,60.8 r90 top
R9S "100R" CR2012-0805#1 148.75,69.2 r180 top
R10 "4k7" CR2012-0805#1 58.55,61 r90 top
R10S "100R" CR2012-0805#1 159.55,58 r0 top
R11 "4k7" CR2012-0805#1 46.55,3.4 r90 bottom
R11S "100R" CR2012-0805#1 148.75,66.6 r180 top
R12 "4k7" CR2012-0805#1 48.26,8.255 r90 bottom
R12S "100R" CR2012-0805#1 152.55,63.4 r180 top
R13 "4k7" CR2012-0805#1 52.07,7.62 r90 bottom
R13S "4k7" CR2012-0805#1 151.95,83.8 r90 top
R14 "4k7" CR2012-0805#1 55.88,8.255 r90 bottom
R14S "4k7" CR2012-0805#1 150.55,99 r270 top
R15 "4k7" CR2012-0805#1 59.69,7.62 r90 bottom
R15S "4k7" CR2012-0805#1 145.35,99 r270 top
R16 "4k7" CR2012-0805#1 63.5,8.255 r90 bottom
R16S "4k7" CR2012-0805#1 142.75,99 r270 top
R17 "4k7" CR2012-0805#1 67.31,7.62 r90 bottom
R17S "4k7" CR2012-0805#1 140.15,99 r270 top
R18 "4k7" CR2012-0805#1 73.75,9.8 r90 bottom
R18S "4k7" CR2012-0805#1 132.35,99 r270 top
R19 "4k7" CR2012-0805#1 71.15,61 r90 top
R19S "4k7" CR2012-0805#1 129.75,99 r270 top
R20 "4k7" CR2012-0805#1 83.95,61 r90 top
R20S "4k7" CR2012-0805#1 147.95,99 r270 top
R21 "4k7" CR2012-0805#1 157.75,13.2 r270 top
R21S "100R" CR2012-0805#1 124.55,99 r270 top
R22 "4k7" CR2012-0805#1 96.52,60.96 r90 top
R22S "100R" CR2012-0805#1 159.55,63.2 r180 top
R23 "4k7" CR2012-0805#1 109.22,60.96 r90 top
R23S "100R" CR2012-0805#1 146.75,83.8 r90 top
R24 "100R" CR2012-0805#1 133.55,13.4 r90 top
R24S "100R" CR2012-0805#1 149.35,83.8 r90 top
R25 "270R" CR2012-0805#1 52.705,86.995 r270 bottom
R25S "100R" CR2012-0805#1 137.55,99 r90 top
R26 "270R" CR2012-0805#1 65.405,86.995 r270 bottom
R26S "100R" CR2012-0805#1 157.15,83.8 r90 top
R27 "270R" CR2012-0805#1 78.105,86.995 r270 bottom
R27S "100R" CR2012-0805#1 159.75,83.8 r90 top
R28 "270R" CR2012-0805#1 90.805,86.995 r270 bottom
R28S "100R" CR2012-0805#1 153.15,99 r90 top
R29 "270R" CR2012-0805#1 55.88,85.725 r270 bottom
R29S "100R" CR2012-0805#1 154.55,83.8 r90 top
R30 "270R" CR2012-0805#1 68.58,85.725 r270 bottom
R30S "4k7" CR2012-0805#1 163.35,20.2 r90 top
R31 "270R" CR2012-0805#1 81.28,85.725 r270 bottom
R31S "10R" CR2012-0805#1 154.94,20.32 r180 top
R32 "270R" CR2012-0805#1 93.98,85.725 r270 bottom
R32S "120R 1%" CR2012-0805#1 9.75,61.6 r270 top
R33 "270R" CR2012-0805#1 52.705,80.645 r90 bottom
R33S "120R 1%" CR2012-0805#1 154.94,43.815 r0 top
R34 "270R" CR2012-0805#1 65.405,80.645 r90 bottom
R34S "120R 1%" CR2012-0805#1 154.94,41.275 r180 top
R35 "270R" CR2012-0805#1 78.105,80.645 r90 bottom
R35S "220R 1%" CR2012-0805#1 4.55,61.6 r270 top
R36 "270R" CR2012-0805#1 90.805,80.645 r90 bottom
R36S "1K8 1%" CR2012-0805#1 7.15,61.6 r270 top
R37 "270R" CR2012-0805#1 49.53,79.375 r90 bottom
R37S "Do Not Mount" CR2012-0805#1 154.94,22.86 r0 top
R38 "270R" CR2012-0805#1 62.23,79.375 r90 bottom
R38S "470R" CR2012-0805#1 161.75,15 r0 top
R39 "270R" CR2012-0805#1 74.93,79.375 r90 bottom
R40 "270R" CR2012-0805#1 87.63,79.375 r90 bottom
R41 "270R" CR2012-0805#1 46.35,80.62 r90 bottom
R42 "270R" CR2012-0805#1 59.055,80.645 r90 bottom
R43 "270R" CR2012-0805#1 71.755,80.645 r90 bottom
R44 "270R" CR2012-0805#1 84.455,80.645 r90 bottom
R45 "270R" CR2012-0805#1 49.53,85.725 r270 bottom
R46 "270R" CR2012-0805#1 62.23,85.725 r270 bottom
R47 "270R" CR2012-0805#1 74.93,85.725 r270 bottom
R48 "270R" CR2012-0805#1 87.63,85.725 r270 bottom
R49 "270R" CR2012-0805#1 46.355,86.995 r270 bottom
R50 "270R" CR2012-0805#1 59.055,86.995 r270 bottom
R51 "270R" CR2012-0805#1 71.755,86.995 r270 bottom
R52 "270R" CR2012-0805#1 84.455,86.995 r270 bottom
R53 "270R" CR2012-0805#1 55.88,79.375 r90 bottom
R54 "270R" CR2012-0805#2 68.58,79.375 r90 bottom
R55 "270R" CR2012-0805#1 81.35,79.42 r90 bottom
R56 "270R" CR2012-0805#1 93.98,79.375 r90 bottom
R57 "270R" CR2012-0805#1 103.505,86.995 r270 bottom
R58 "270R" CR2012-0805#1 116.205,86.995 r270 bottom
R59 "270R" CR2012-0805#1 106.68,85.725 r270 bottom
R60 "270R" CR2012-0805#1 119.38,85.725 r270 bottom
R61 "270R" CR2012-0805#3 103.55,80.62 r90 bottom
R62 "270R" CR2012-0805#1 116.205,80.645 r90 bottom
R63 "270R" CR2012-0805#1 100.35,79.42 r90 bottom
R64 "270R" CR2012-0805#1 113.03,79.375 r90 bottom
R65 "270R" CR2012-0805#1 97.15,80.62 r90 bottom
R66 "270R" CR2012-0805#1 109.855,80.645 r90 bottom
R67 "270R" CR2012-0805#1 100.33,85.725 r270 bottom
R68 "270R" CR2012-0805#1 113.03,85.725 r270 bottom
R69 "270R" CR2012-0805#1 97.155,86.995 r270 bottom
R70 "270R" CR2012-0805#1 109.855,86.995 r270 bottom
R71 "270R" CR2012-0805#1 106.68,79.375 r90 bottom
R72 "270R" CR2012-0805#1 119.38,79.375 r90 bottom
R73 "270R" CR2012-0805#1 155.15,13.2 r90 top
R74 "270R" CR2012-0805#1 49.53,15.24 r90 top
R75 "270R" CR2012-0805#1 52.07,15.24 r90 top
R76 "270R" CR2012-0805#1 54.61,15.24 r90 top
R77 "270R" CR2012-0805#1 57.15,15.24 r90 top
R78 "270R" CR2012-0805#1 59.69,15.24 r90 top
R79 "270R" CR2012-0805#1 62.23,15.24 r90 top
R80 "270R" CR2012-0805#1 64.77,15.24 r90 top
R81 "270R" CR2012-0805#1 67.31,15.24 r90 top
R82 "2k2" CR2012-0805#1 130.95,13.4 r90 top
R83 "390R" CR2012-0805#1 95.25,107.315 r270 top
R84 "4k7" CR2012-0805#1 155.75,99 r270 top
R85 "4k7" CR2012-0805#1 156.15,103.4 r270 top
R86 "4k7" CR2012-0805#1 120.35,103.6 r270 top
R87 "4k7" CR2012-0805#1 127.15,99 r90 top
R88 "100R" CR2012-0805#1 121.95,99 r90 top
R89 "100R" CR2012-0805#1 119.35,99 r90 top
R90 "100R" CR2012-0805#1 34.35,98.4 r270 top
R91 "100R" CR2012-0805#1 24.325,99.375 r180 top
R92 "100R" CR2012-0805#1 123.825,83.82 r90 top
R93 "100R" CR2012-0805#1 158.35,99 r270 top
R94 "100R" CR2012-0805#1 48.35,100 r90 top
R95 "100R" CR2012-0805#1 79.55,95 r90 top
R96 "270R" CR2012-0805#1 45.75,100 r270 top
R97 "270R" CR2012-0805#1 45.75,104.4 r90 top
R98 "270R" CR2012-0805#1 48.35,104.4 r90 top
R99 "270R" CR2012-0805#1 45.75,108.6 r270 top
R100 "680R" CR2012-0805#1 56.15,95 r90 top
R101 "680R" CR2012-0805#1 53.55,95 r90 top
R102 "680R" CR2012-0805#1 50.95,95 r90 top
R103 "680R" CR2012-0805#1 61.35,95 r90 top
R104 "680R" CR2012-0805#1 58.75,95 r90 top
R105 "680R" CR2012-0805#1 63.95,95 r90 top
R106 "680R" CR2012-0805#1 71.75,95 r90 top
R107 "680R" CR2012-0805#1 69.15,95 r90 top
R108 "680R" CR2012-0805#1 74.35,95 r90 top
R109 "330R" CR2012-0805#1 48.35,95 r90 top
R110 "330R" CR2012-0805#1 66.55,95 r90 top
R111 "330R" CR2012-0805#1 76.95,95 r90 top
R112 "470K" CR2012-0805#1 124.46,20.955 r0 top
R113 "10R" CR2012-0805#1 19.35,19.8 r180 top
R114 "do not mount" CR2012-0805#1 40.35,12.8 r0 top
R115 "do not mount" CR2012-0805#1 32.75,7.4 r90 top
R116 "22k" CR2012-0805#1 18.15,45.8 r0 top
R117 "22k" CR2012-0805#1 5.15,48.4 r0 top
R118 "33k" CR2012-0805#1 18.15,48.4 r180 top
R119 "33k" CR2012-0805#1 5.15,51 r0 top
R120 "10k" CR2012-0805#1 15.4,58.6 r0 top
R121 "10k" CR2012-0805#1 11.35,58.6 r180 top
R122 "47R" CR2012-0805#1 115.35,12.2 r0 top
RN1 "10X-102-4k7" SIL-10/X1.2 14.605,36.195 r180 top
RN2 "10X-102-4k7" SIL-10/X1.2 14.605,28.575 r180 top
S1 "A6ER-8104" DIP-16-KEY 49.53,4 r0 top locked
SW1 "DTSM-61-NR" B3FS_SWITCH 50.8,57.785 r270 top locked
SW2 "DTSM-61-NR" B3FS_SWITCH 63.5,57.785 r270 top locked
SW3 "DTSM-61-NR" B3FS_SWITCH 76.2,57.785 r270 top locked
SW4 "DTSM-61-NR" B3FS_SWITCH 88.9,57.785 r270 top locked
SW5 "DTSM-61-NR" B3FS_SWITCH 101.6,57.785 r270 top locked
SW6 "DTSM-61-NR" B3FS_SWITCH 114.3,57.785 r270 top locked
SW7 "DTSM-61-NR" B3FS_SWITCH 148.95,8.2 r180 top
TP1S "(TDI)" TestPin 148.55,74.8 r270 top
TP2S "(TDO)" TestPin 154.95,60.2 r0 top
TP3S "(TCK)" TestPin 147.35,57.6 r0 top
TP4S "(TMS)" TestPin 151.75,60.2 r0 top
TP5S "(2V50)" TestPin 160.655,54.61 r90 top
TP6S "(5V)" TestPin 118.95,111.8 r90 top
TP7S "(3V3)" TestPin 45.95,57.2 r90 top
TP8S "(1V20)" TestPin 160.655,34.29 r90 top
U1 "LM4880M" M08A 11.75,50.6 r90 top
U1S "SN74LV244W" SSO-G20/P.65 156.15,69.2 r270 top
U2 "LMV358M" M08A 14.55,22.6 r0 top
U2S "LM1084IS-ADJ" TO-263 7.61,66.95 r0 top
U3 "SN74LV04D" D014 121.92,15.24 r180 top
U3S "LM1084IS-ADJ" TO-263 148.55,46 r90 top
U4 "MAX3232CSE" TSSO5x6-G16 19.55,96.6 r0 top
U4S "LM1084IS-ADJ" TO-263 148.55,23.495 r90 top
U5 "SRAM 256Kx16 TSOP44" SO-G44/P.8 57.785,34.29 r270 top
U6 "SRAM 256Kx16 TSOP44" SO-G44/P.8 107.15,34.2 r270 top

## Footprints (in the part's own frame and the unit in brackets; to place one, negate y for a bottom-side part, rotate by r counter-clockwise, add the part's x,y. Pads: shape width x height; smd on the part's side, far side on the other; paste and mask are expansions set on the pad)
Altium [mm] "Altium Logo"
  silkscreen extent 0,-0.08 17.6,3.84
B3FS_SWITCH [mm]
  rect 1.6x1.4 smd: 1(4.01,-2.25) 2(-4,-2.25) 3(4.01,2.24) 4(-4,2.24)
  silkscreen extent -3.16,-3.16 3.15,3.15
"CAP D5MM/P2MM" [mil]
  rect 60x60 hole 28: 1(0,0)
  round 60 hole 28: 2(78.74,0)
  silkscreen extent -59,-98 138,98
"CAP D5mm/P2mm" [mil]
  rect 60x60 hole 28: 1(0,0)
  round 60 hole 28: 2(78.74,0)
  silkscreen extent -59,-98 138,98
CC1608-0603#1 [mm]
  rect 1.1x1 smd: 1(-0.85,0) 2(0.85,0)
  silkscreen extent -0.85,-0.75 0.85,0.75
CC1608-0603#2 [mm]
  rect 1.1x1 smd: 1(-0.85,0) 2(0.9,0)
  silkscreen extent -0.85,-0.75 0.85,0.75
CC2012-0805 [mm]
  rect 1.3x1.5 smd: 1(-0.95,0) 2(0.95,0)
  silkscreen extent -1.1,-1 1.1,1
CC3216-1206 [mm]
  rect 1.6x1.8 smd: 1(-1.4,0) 2(1.4,0)
  silkscreen extent -1.7,-1.15 1.7,1.15
CR2012-0805#1 [mm]
  rect 1.3x1.5 smd: 1(-0.95,0) 2(0.95,0)
  silkscreen extent -1.1,-1 1.1,1
CR2012-0805#2 [mm]
  rect 1.3x1.5 smd: 1(-0.95,0) 2(0.972,0.043)
  silkscreen extent -1.1,-1 1.1,1
CR2012-0805#3 [mm]
  rect 1.3x1.5 smd: 1(-0.945,-0.01) 2(0.95,0)
  silkscreen extent -1.1,-1 1.1,1
D014 [mm] "Small Outline; 14 Leads; Body Width 3.9 mm; Pitch 1.27 mm"
  rect 0.6x2.05 smd: 1(-3.81,-2.675) 2(-2.54,-2.675) 3(-1.27,-2.675) 4(0,-2.675) 5(1.27,-2.675) 6(2.54,-2.675) 7(3.81,-2.675) 8(3.81,2.675) 9(2.54,2.675) 10(1.27,2.675) 11(0,2.675) 12(-1.27,2.675) 13(-2.54,2.675) 14(-3.81,2.675)
  silkscreen extent -4.78,-2.8 4.38,1.25
DB15-VGA-Female [mm]
  rect 1.6x1.6 hole 1.1: 1(0,0)
  round 1.6 hole 1.1: 2(2.29,0) 3(4.58,0) 4(6.87,0) 5(9.16,0) 6(-1.4,2.54) 7(0.89,2.54) 8(3.18,2.54) 9(5.47,2.54) 10(7.76,2.54) 11(0,5.08) 12(2.29,5.08) 13(4.58,5.08) 14(6.87,5.08) 15(9.16,5.08)
  round 5 hole 3.3: 16(-7.915,2.54) 17(17.075,2.54)
  silkscreen extent -10.83,-2.65 20.01,19.61
DIP-16-KEY [mm]
  rect 1.5x1.5 hole 0.9: 1(0,0)
  round 1.5 hole 0.9: 2(2.54,0) 3(5.08,0) 4(7.62,0) 5(10.16,0) 6(12.7,0) 7(15.24,0) 8(17.78,0) 9(17.78,7.62) 10(15.24,7.62) 11(12.7,7.62) 12(10.16,7.62) 13(7.62,7.62) 14(5.08,7.62) 15(2.54,7.62) 16(0,7.62)
  silkscreen extent -2.05,-1.59 19.83,9.2
DO214 [mil]
  rect 85x110 smd: 1(-87.5,0) 2(87.5,0)
  silkscreen extent -90,-78 90,78
DSUB1.385-2H9 [mm]
  rect 1.69x1.69 hole 1.1: 1(-5.54,-10.92)
  round 1.69 hole 1.1: 2(-2.77,-10.92) 3(0,-10.92) 4(2.77,-10.92) 5(5.54,-10.92) 6(-4.155,-8.08) 7(-1.385,-8.08) 8(1.385,-8.08) 9(4.155,-8.08)
  round 4.76 hole 3.3: 10(-12.495,-9.5) 11(12.495,-9.5)
  silkscreen extent -15.4,-12.4 15.4,6
FG456 [mm] "456-Ball Fine Pitch Ball Grid Array (FG456)"
  round 0.4 smd mask+0.1: A1(-10.5,10.5) A2(-9.5,10.5) A3(-8.5,10.5) A4(-7.5,10.5) A5(-6.5,10.5) A6(-5.5,10.5) A7(-4.5,10.5) A8(-3.5,10.5) A9(-2.5,10.5) A10(-1.5,10.5) A11(-0.5,10.5) A12(0.5,10.5) A13(1.5,10.5) A14(2.5,10.5) A15(3.5,10.5) A16(4.5,10.5) A17(5.5,10.5) A18(6.5,10.5) A19(7.5,10.5) A20(8.5,10.5) A21(9.5,10.5) A22(10.5,10.5) AA1(-10.5,-9.5) AA2(-9.5,-9.5) AA3(-8.5,-9.5) AA4(-7.5,-9.5) AA5(-6.5,-9.5) AA6(-5.5,-9.5) AA7(-4.5,-9.5) AA8(-3.5,-9.5) AA9(-2.5,-9.5) AA10(-1.5,-9.5) AA11(-0.5,-9.5) AA12(0.5,-9.5) AA13(1.5,-9.5) AA14(2.5,-9.5) AA15(3.5,-9.5) AA16(4.5,-9.5) AA17(5.5,-9.5) AA18(6.5,-9.5) AA19(7.5,-9.5) AA20(8.5,-9.5) AA21(9.5,-9.5) AA22(10.5,-9.5) AB1(-10.5,-10.5) AB2(-9.5,-10.5) AB3(-8.5,-10.5) AB4(-7.5,-10.5) AB5(-6.5,-10.5) AB6(-5.5,-10.5) AB7(-4.5,-10.5) AB8(-3.5,-10.5) AB9(-2.5,-10.5) AB10(-1.5,-10.5) AB11(-0.5,-10.5) AB12(0.5,-10.5) AB13(1.5,-10.5) AB14(2.5,-10.5) AB15(3.5,-10.5) AB16(4.5,-10.5) AB17(5.5,-10.5) AB18(6.5,-10.5) AB19(7.5,-10.5) AB20(8.5,-10.5) AB21(9.5,-10.5) AB22(10.5,-10.5) B1(-10.5,9.5) B2(-9.5,9.5) B3(-8.5,9.5) B4(-7.5,9.5) B5(-6.5,9.5) B6(-5.5,9.5) B7(-4.5,9.5) B8(-3.5,9.5) B9(-2.5,9.5) B10(-1.5,9.5) B11(-0.5,9.5) B12(0.5,9.5) B13(1.5,9.5) B14(2.5,9.5) B15(3.5,9.5) B16(4.5,9.5) B17(5.5,9.5) B18(6.5,9.5) B19(7.5,9.5) B20(8.5,9.5) B21(9.5,9.5) B22(10.5,9.5) C1(-10.5,8.5) C2(-9.5,8.5) C3(-8.5,8.5) C4(-7.5,8.5) C5(-6.5,8.5) C6(-5.5,8.5) C7(-4.5,8.5) C8(-3.5,8.5) C9(-2.5,8.5) C10(-1.5,8.5) C11(-0.5,8.5) C12(0.5,8.5) C13(1.5,8.5) C14(2.5,8.5) C15(3.5,8.5) C16(4.5,8.5) C17(5.5,8.5) C18(6.5,8.5) C19(7.5,8.5) C20(8.5,8.5) C21(9.5,8.5) C22(10.5,8.5) D1(-10.5,7.5) D2(-9.5,7.5) D3(-8.5,7.5) D4(-7.5,7.5) D5(-6.5,7.5) D6(-5.5,7.5) D7(-4.5,7.5) D8(-3.5,7.5) D9(-2.5,7.5) D10(-1.5,7.5) D11(-0.5,7.5) D12(0.5,7.5) D13(1.5,7.5) D14(2.5,7.5) D15(3.5,7.5) D16(4.5,7.5) D17(5.5,7.5) D18(6.5,7.5) D19(7.5,7.5) D20(8.5,7.5) D21(9.5,7.5) D22(10.5,7.5) E1(-10.5,6.5) E2(-9.5,6.5) E3(-8.5,6.5) E4(-7.5,6.5) E5(-6.5,6.5) E6(-5.5,6.5) E7(-4.5,6.5) E8(-3.5,6.5) E9(-2.5,6.5) E10(-1.5,6.5) E11(-0.5,6.5) E12(0.5,6.5) E13(1.5,6.5) E14(2.5,6.5) E15(3.5,6.5) E16(4.5,6.5) E17(5.5,6.5) E18(6.5,6.5) E19(7.5,6.5) E20(8.5,6.5) E21(9.5,6.5) E22(10.5,6.5) F1(-10.5,5.5) F2(-9.5,5.5) F3(-8.5,5.5) F4(-7.5,5.5) F5(-6.5,5.5) F6(-5.5,5.5) F7(-4.5,5.5) F8(-3.5,5.5) F9(-2.5,5.5) F10(-1.5,5.5) F11(-0.5,5.5) F12(0.5,5.5) F13(1.5,5.5) F14(2.5,5.5) F15(3.5,5.5) F16(4.5,5.5) F17(5.5,5.5) F18(6.5,5.5) F19(7.5,5.5) F20(8.5,5.5) F21(9.5,5.5) F22(10.5,5.5) G1(-10.5,4.5) G2(-9.5,4.5) G3(-8.5,4.5) G4(-7.5,4.5) G5(-6.5,4.5) G6(-5.5,4.5) G7(-4.5,4.5) G8(-3.5,4.5) G9(-2.5,4.5) G10(-1.5,4.5) G11(-0.5,4.5) G12(0.5,4.5) G13(1.5,4.5) G14(2.5,4.5) G15(3.5,4.5) G16(4.5,4.5) G17(5.5,4.5) G18(6.5,4.5) G19(7.5,4.5) G20(8.5,4.5) G21(9.5,4.5) G22(10.5,4.5) H1(-10.5,3.5) H2(-9.5,3.5) H3(-8.5,3.5) H4(-7.5,3.5) H5(-6.5,3.5) H6(-5.5,3.5) H7(-4.5,3.5) H16(4.5,3.5) H17(5.5,3.5) H18(6.5,3.5) H19(7.5,3.5) H20(8.5,3.5) H21(9.5,3.5) H22(10.5,3.5) J1(-10.5,2.5) J2(-9.5,2.5) J3(-8.5,2.5) J4(-7.5,2.5) J5(-6.5,2.5) J6(-5.5,2.5) J7(-4.5,2.5) J9(-2.5,2.5) J10(-1.5,2.5) J11(-0.5,2.5) J12(0.5,2.5) J13(1.5,2.5) J14(2.5,2.5) J16(4.5,2.5) J17(5.5,2.5) J18(6.5,2.5) J19(7.5,2.5) J20(8.5,2.5) J21(9.5,2.5) J22(10.5,2.5) K1(-10.5,1.5) K2(-9.5,1.5) K3(-8.5,1.5) K4(-7.5,1.5) K5(-6.5,1.5) K6(-5.5,1.5) K7(-4.5,1.5) K9(-2.5,1.5) K10(-1.5,1.5) K11(-0.5,1.5) K12(0.5,1.5) K13(1.5,1.5) K14(2.5,1.5) K16(4.5,1.5) K17(5.5,1.5) K18(6.5,1.5) K19(7.5,1.5) K20(8.5,1.5) K21(9.5,1.5) K22(10.5,1.5) L1(-10.5,0.5) L2(-9.5,0.5) L3(-8.5,0.5) L4(-7.5,0.5) L5(-6.5,0.5) L6(-5.5,0.5) L7(-4.5,0.5) L9(-2.5,0.5) L10(-1.5,0.5) L11(-0.5,0.5) L12(0.5,0.5) L13(1.5,0.5) L14(2.5,0.5) L16(4.5,0.5) L17(5.5,0.5) L18(6.5,0.5) L19(7.5,0.5) L20(8.5,0.5) L21(9.5,0.5) L22(10.5,0.5) M1(-10.5,-0.5) M2(-9.5,-0.5) M3(-8.5,-0.5) M4(-7.5,-0.5) M5(-6.5,-0.5) M6(-5.5,-0.5) M7(-4.5,-0.5) M9(-2.5,-0.5) M10(-1.5,-0.5) M11(-0.5,-0.5) M12(0.5,-0.5) M13(1.5,-0.5) M14(2.5,-0.5) M16(4.5,-0.5) M17(5.5,-0.5) M18(6.5,-0.5) M19(7.5,-0.5) M20(8.5,-0.5) M21(9.5,-0.5) M22(10.5,-0.5) N1(-10.5,-1.5) N2(-9.5,-1.5) N3(-8.5,-1.5) N4(-7.5,-1.5) N5(-6.5,-1.5) N6(-5.5,-1.5) N7(-4.5,-1.5) N9(-2.5,-1.5) N10(-1.5,-1.5) N11(-0.5,-1.5) N12(0.5,-1.5) N13(1.5,-1.5) N14(2.5,-1.5) N16(4.5,-1.5) N17(5.5,-1.5) N18(6.5,-1.5) N19(7.5,-1.5) N20(8.5,-1.5) N21(9.5,-1.5) N22(10.5,-1.5) P1(-10.5,-2.5) P2(-9.5,-2.5) P3(-8.5,-2.5) P4(-7.5,-2.5) P5(-6.5,-2.5) P6(-5.5,-2.5) P7(-4.5,-2.5) P9(-2.5,-2.5) P10(-1.5,-2.5) P11(-0.5,-2.5) P12(0.5,-2.5) P13(1.5,-2.5) P14(2.5,-2.5) P16(4.5,-2.5) P17(5.5,-2.5) P18(6.5,-2.5) P19(7.5,-2.5) P20(8.5,-2.5) P21(9.5,-2.5) P22(10.5,-2.5) R1(-10.5,-3.5) R2(-9.5,-3.5) R3(-8.5,-3.5) R4(-7.5,-3.5) R5(-6.5,-3.5) R6(-5.5,-3.5) R7(-4.5,-3.5) R16(4.5,-3.5) R17(5.5,-3.5) R18(6.5,-3.5) R19(7.5,-3.5) R20(8.5,-3.5) R21(9.5,-3.5) R22(10.5,-3.5) T1(-10.5,-4.5) T2(-9.5,-4.5) T3(-8.5,-4.5) T4(-7.5,-4.5) T5(-6.5,-4.5) T6(-5.5,-4.5) T7(-4.5,-4.5) T8(-3.5,-4.5) T9(-2.5,-4.5) T10(-1.5,-4.5) T11(-0.5,-4.5) T12(0.5,-4.5) T13(1.5,-4.5) T14(2.5,-4.5) T15(3.5,-4.5) T16(4.5,-4.5) T17(5.5,-4.5) T18(6.5,-4.5) T19(7.5,-4.5) T20(8.5,-4.5) T21(9.5,-4.5) T22(10.5,-4.5) U1(-10.5,-5.5) U2(-9.5,-5.5) U3(-8.5,-5.5) U4(-7.5,-5.5) U5(-6.5,-5.5) U6(-5.5,-5.5) U7(-4.5,-5.5) U8(-3.5,-5.5) U9(-2.5,-5.5) U10(-1.5,-5.5) U11(-0.5,-5.5) U12(0.5,-5.5) U13(1.5,-5.5) U14(2.5,-5.5) U15(3.5,-5.5) U16(4.5,-5.5) U17(5.5,-5.5) U18(6.5,-5.5) U19(7.5,-5.5) U20(8.5,-5.5) U21(9.5,-5.5) U22(10.5,-5.5) V1(-10.5,-6.5) V2(-9.5,-6.5) V3(-8.5,-6.5) V4(-7.5,-6.5) V5(-6.5,-6.5) V6(-5.5,-6.5) V7(-4.5,-6.5) V8(-3.5,-6.5) V9(-2.5,-6.5) V10(-1.5,-6.5) V11(-0.5,-6.5) V12(0.5,-6.5) V13(1.5,-6.5) V14(2.5,-6.5) V15(3.5,-6.5) V16(4.5,-6.5) V17(5.5,-6.5) V18(6.5,-6.5) V19(7.5,-6.5) V20(8.5,-6.5) V21(9.5,-6.5) V22(10.5,-6.5) W1(-10.5,-7.5) W2(-9.5,-7.5) W3(-8.5,-7.5) W4(-7.5,-7.5) W5(-6.5,-7.5) W6(-5.5,-7.5) W7(-4.5,-7.5) W8(-3.5,-7.5) W9(-2.5,-7.5) W10(-1.5,-7.5) W11(-0.5,-7.5) W12(0.5,-7.5) W13(1.5,-7.5) W14(2.5,-7.5) W15(3.5,-7.5) W16(4.5,-7.5) W17(5.5,-7.5) W18(6.5,-7.5) W19(7.5,-7.5) W20(8.5,-7.5) W21(9.5,-7.5) W22(10.5,-7.5) Y1(-10.5,-8.5) Y2(-9.5,-8.5) Y3(-8.5,-8.5) Y4(-7.5,-8.5) Y5(-6.5,-8.5) Y6(-5.5,-8.5) Y7(-4.5,-8.5) Y8(-3.5,-8.5) Y9(-2.5,-8.5) Y10(-1.5,-8.5) Y11(-0.5,-8.5) Y12(0.5,-8.5) Y13(1.5,-8.5) Y14(2.5,-8.5) Y15(3.5,-8.5) Y16(4.5,-8.5) Y17(5.5,-8.5) Y18(6.5,-8.5) Y19(7.5,-8.5) Y20(8.5,-8.5) Y21(9.5,-8.5) Y22(10.5,-8.5)
  silkscreen extent -12.27,-11.5 11.5,11.5
HDR1X2 [mm]
  rect 1.5x1.5 hole 0.9: 1(0,0)
  round 1.5 hole 0.9: 2(2.54,0)
  silkscreen extent -1.27,-1.27 3.81,1.27
HDR2X2_B [mm]
  rect 1.5x1.5 hole 0.9: 1(0,0)
  round 1.5 hole 0.9: 2(0,2.54) 3(2.54,0) 4(2.54,2.54)
  silkscreen extent -1.27,-1.27 3.81,3.81
HDR2X10 [mm]
  rect 1.5x1.5 hole 0.9: 1(0,0)
  round 1.5 hole 0.9: 2(0,2.54) 3(2.54,0) 4(2.54,2.54) 5(5.08,0) 6(5.08,2.54) 7(7.62,0) 8(7.62,2.54) 9(10.16,0) 10(10.16,2.54) 11(12.7,0) 12(12.7,2.54) 13(15.24,0) 14(15.24,2.54) 15(17.78,0) 16(17.78,2.54) 17(20.32,0) 18(20.32,2.54) 19(22.86,0) 20(22.86,2.54)
  silkscreen extent -1.27,-1.27 24.13,3.81
HDR2X13_CEN_LP [mm]
  rect 1.5x1.5 hole 0.9: 1(0,0)
  round 1.5 hole 0.9: 2(2.54,0) 3(5.08,0) 4(7.62,0) 5(10.16,0) 6(12.7,0) 7(15.24,0) 8(17.78,0) 9(20.32,0) 10(22.86,0) 11(25.4,0) 12(27.94,0) 13(30.48,0) 14(0,2.54) 15(2.54,2.54) 16(5.08,2.54) 17(7.62,2.54) 18(10.16,2.54) 19(12.7,2.54) 20(15.24,2.54) 21(17.78,2.54) 22(20.32,2.54) 23(22.86,2.54) 24(25.4,2.54) 25(27.94,2.54) 26(30.48,2.54)
  silkscreen extent -5.08,-3.18 35.56,5.72
KLD-0202 [mm]
  oval 2x4.5 all layers, no hole: 1(13.7,0)
  round 1.5 hole 1: 1A(13.7,-1.25) 1B(13.7,1.25) 2A(7.5,-1) 2B(7.5,1) 3A(9.5,-5) 3B(11.5,-5)
  oval 2x4 all layers, no hole: 2(7.5,0)
  oval 4x2 all layers, no hole: 3(10.5,-5)
  silkscreen extent 0,-4.5 14.6,4.5
"Live Design Evaluation Board" [mm] "Live Design Logo"
  silkscreen extent 0.03,0 33.78,10.44
M08A [mm] "Small Outline; 8 Leads; Body Width 3.9 mm; Pitch 1.27 mm"
  rect 0.6x2.2 smd: 1(-1.905,-2.6) 2(-0.635,-2.6) 3(0.635,-2.6) 4(1.905,-2.6) 5(1.905,2.6) 6(0.635,2.6) 7(-0.635,2.6) 8(-1.905,2.6)
  silkscreen extent -2.88,-2.72 2.5,1.1
MCCT-B#1 [mm]
  rect 2x2.2 smd: 1(-1.5,0) 2(1.5,0)
  silkscreen extent -2.3,-1.6 1.8,1.6
MCCT-B#2 [mm]
  rect 1.9x2.2 smd: 1(-1.5,0) 2(1.5,0)
  silkscreen extent -2.3,-1.6 1.8,1.6
MDJ-F-06 [mm]
  round 1.5 hole 0.9: 1(8.5,-1.3) 2(8.5,1.3) 3(8.5,-3.4) 5(8.5,3.4) 6(11,-3.4) 8(11,3.4)
  round 3.65 hole 2.2: MH1(5.5,-6.75) MH2(4.7,0) MH3(5.5,6.75)
  silkscreen extent 0,-7 12.9,7
PIN2 [mm]
  rect 1.5x1.5 hole 0.9: 1(0,0)
  round 1.5 hole 0.9: 2(2.54,0)
  silkscreen extent -1.4,-1.4 3.94,2.17
QC49/SMD [mm]
  rect 5x2 smd: 1(-4.75,0) 2(4.75,0)
  silkscreen extent -6.75,-2.4 5.7,2.4
R09A12V01-E [mm] "www.sundiode.com/R09A-8.htm"
  round 2 hole 1: 1(0,-3.3) 2(-2.5,-5.8) 3(-2.5,-3.3) 4(2.5,-3.3) 5(2.5,-5.8)
  oval 3x3.5 hole 2.4: 6(5,0) 7(-5,0)
  silkscreen extent -4.9,-15 4.9,2.4
RB8/3.5 [mil]
  rect 70x70 hole 27.56: 1(0,60)
  round 70 hole 27.56: 2(0,-60)
  silkscreen extent -160,-160 160,160
SA/SC56 [mm] "KingBright 14.2mm (0.56\") Single Digit 7 Segment LED Display"
  rect 1.5x1.5 hole 0.7: 1(0,0)
  round 1.5 hole 0.7: 2(2.54,0) 3(5.08,0) 4(7.62,0) 5(10.16,0) 6(10.16,15.24) 7(7.62,15.24) 8(5.08,15.24) 9(2.54,15.24) 10(0,15.24)
  silkscreen extent -1.32,-1.83 11.48,17.07
"Serial Number" [mm] "Serial Number overlay"
  silkscreen extent 0,0 31.89,6.13
SIL-10/X1.2 [mil] "SIP; 10 Leads; Body 5.8 x 25.3 x 2.8 mm (typ); Pitch 2.54 mm"
  rect 60x60 hole 28: 1(-450,0)
  round 60 hole 28: 2(-350,0) 3(-250,0) 4(-150,0) 5(-50,0) 6(50,0) 7(150,0) 8(250,0) 9(350,0) 10(450,0)
  silkscreen extent -516,-59 516,59
"SMD _LED" [mm]
  rect 1.3x1.6 smd: 1(0.95,0) 2(-0.95,0)
  silkscreen extent -2.13,-1.15 2,1.15
SO-G3 [mm]
  rect 0.85x1.3 smd: 1(-0.95,-1.1) 2(0.95,-1.1) 3(0,1.1)
  silkscreen extent -1.95,-1.32 1.95,0.3
SO-G44/P.8 [mm]
  rect 0.45x1.45 smd: 1(-8.4,-5.575) 2(-7.6,-5.575) 3(-6.8,-5.575) 4(-6,-5.575) 5(-5.2,-5.575) 6(-4.4,-5.575) 7(-3.6,-5.575) 8(-2.8,-5.575) 9(-2,-5.575) 10(-1.2,-5.575) 11(-0.4,-5.575) 12(0.4,-5.575) 13(1.2,-5.575) 14(2,-5.575) 15(2.8,-5.575) 16(3.6,-5.575) 17(4.4,-5.575) 18(5.2,-5.575) 19(6,-5.575) 20(6.8,-5.575) 21(7.6,-5.575) 22(8.4,-5.575) 23(8.4,5.575) 24(7.6,5.575) 25(6.8,5.575) 26(6,5.575) 27(5.2,5.575) 28(4.4,5.575) 29(3.6,5.575) 30(2.8,5.575) 31(2,5.575) 32(1.2,5.575) 33(0.4,5.575) 34(-0.4,5.575) 35(-1.2,5.575) 36(-2,5.575) 37(-2.8,5.575) 38(-3.6,5.575) 39(-4.4,5.575) 40(-5.2,5.575) 41(-6,5.575) 42(-6.8,5.575) 43(-7.6,5.575) 44(-8.4,5.575)
  silkscreen extent -9.3,-5.7 9.25,4.45
SSO-G20/P.65 [mm]
  rect 0.4x2.15 smd: 1(-2.925,-3.275) 2(-2.275,-3.275) 3(-1.625,-3.275) 4(-0.975,-3.275) 5(-0.325,-3.275) 6(0.325,-3.275) 7(0.975,-3.275) 8(1.625,-3.275) 9(2.275,-3.275) 10(2.925,-3.275) 11(2.925,3.275) 12(2.275,3.275) 13(1.625,3.275) 14(0.975,3.275) 15(0.325,3.275) 16(-0.325,3.275) 17(-0.975,3.275) 18(-1.625,3.275) 19(-2.275,3.275) 20(-2.925,3.275)
  silkscreen extent -3.8,-3.4 3.75,1.8
ST-3150-5N [mm]
  oval 2.7x1.8 all layers, no hole: 1(-0.85,-5.2) 2(1.15,-7.65) 3(-0.85,-11.35) 4(1.15,-13.25) 5(-0.85,-17)
  round 1.2 hole 1: 1A(-1.3,-5.2) 1B(-0.4,-5.2) 2A(0.7,-7.65) 2B(1.6,-7.65) 3A(-1.3,-11.35) 3B(-0.4,-11.35) 4A(0.7,-13.25) 4B(1.6,-13.25) 5A(-1.3,-17) 5B(-0.4,-17)
  silkscreen extent -4.9,-18 3.2,0
TestPin [mil] "SingleTest Pin"
  round 60 hole 35: 1(0,0)
TO-263 [mm]
  rect 1x3.4 smd: 1(0,0) 2(2.54,0) 3(5.08,0)
  rect 10.25x8.9 smd: 4(2.54,10.45)
  silkscreen extent -3.1,-3.12 8.2,15
TSSO5x6-G16 [mm] "Shrink Small Outline; 16 Leads; Body Width 4.4 mm"
  rect 0.3x1.65 smd: 1(-2.275,-2.775) 2(-1.625,-2.775) 3(-0.975,-2.775) 4(-0.325,-2.775) 5(0.325,-2.775) 6(0.975,-2.775) 7(1.625,-2.775) 8(2.275,-2.775) 9(2.275,2.775) 10(1.625,2.775) 11(0.975,2.775) 12(0.325,2.775) 13(-0.325,2.775) 14(-0.975,2.775) 15(-1.625,2.775) 16(-2.275,2.775)
  silkscreen extent -3.1,-2.9 2.55,1.55

## Part data
C1 C2 C3 C4 C5 C18 C19 C36 C37 C38 C51S C52S C53S C54S C55S C56S C57S C58S C59S C60S C69S C70S C71S C72S C73S C74S C75S C76S C77S C78S C79S: library part CAP_POLAR, "Polar Capacitor"
C1S C2S C3S C4S C5S C6 C6S C7 C7S C8 C8S C9 C9S C10 C10S C11 C11S C12 C12S C13 C13S C14 C14S C15 C15S C16 C16S C17 C17S C18S C19S C20 C20S C21 C21S C22 C22S C23 C23S C24 C24S C25 C25S C26 C26S C27 C27S C28 C28S C29 C29S C30 C30S C31 C31S C32 C32S C33 C33S C34 C34S C35 C35S C36S C37S C38S C39 C39S C40S C41S C42S C43S C44S C45S C46S C47S C48S C49S C50S C61S C62S C63S C64S C65S C66S C67S C68S C80S: library part CAP, "Capacitor"
C40 C41: library part "CAP Electro Bipolar", "Electrolytic Bipolar Capacitor"
CR1: library part QC49/SMD, "SMD Crystal 20MHz HY-Q"
D1S: library part BZG03C13, "Zener Diode, 6.2V, 5W"
D2S: "Shottky Diode Pair"
DS1 DS2 DS3 DS4 DS5 DS6: "14.2 mm General Purpose 7-Segment Display: CC, RH DP"
FPGA1S: "Spartan-3 1.2V FPGA, 264 User I/Os, 456-ball FBGA, High Performance, Commercial Grade"
GJ1S GJ2S GJ3S GJ4S: "Header, 2-Pin"
HDR1 HDR2: "Header, 10-Pin, Dual row"
J1 J6: "3-Conductor Jack with 2 break contacts (normals) and 2 auxiliary make contacts"
J1S: library part "Header 13X2A", "Header, 13-Pin, Dual row"
J2 J3: "Circular DIN, 6 Postion, Jack, Pitch 2.1/2.6 mm"
J2S: "Low Voltage Power Supply Connector"
J4: library part "D Connector 9", "Receptacle Assembly, 9 Position, Right Angle"
J5: "Dsub-15 High density VGA Female connetor"
JP1 JP2: "Header, 2-Pin, Dual row"
L1: library part Inductor, "Inductor"
LD0 LD1 LD2 LD3 LD4 LD5 LD6 LD7 LED1 LED4 LED5 LED6 LED7: library part HSMX-C670, "Typical RED GaAs SMD LED Agilent make"
LED2: library part HSMX-C670, "Typical GREEN GaAs SMD LED Agilent make"
LS1 LS2: "Loudspeaker"
P1: library part "POT Dual Gang Shield", "Alps Stereo Pot"
R1 R1S R2 R2S R3 R3S R4 R4S R5 R5S R6 R6S R7 R7S R8 R8S R9 R9S R10 R10S R11 R11S R12 R12S R13 R13S R14 R14S R15 R15S R16 R16S R17 R17S R18 R18S R19 R19S R20 R20S R21 R21S R22 R22S R23 R23S R24 R24S R25 R25S R26 R26S R27 R27S R28 R28S R29 R29S R30 R30S R31 R31S R32 R32S R33 R33S R34 R34S R35 R35S R36 R36S R37 R37S R38 R38S R39 R40 R41 R42 R43 R44 R45 R46 R47 R48 R49 R50 R51 R52 R53 R54 R55 R56 R57 R58 R59 R60 R61 R62 R63 R64 R65 R66 R67 R68 R69 R70 R71 R72 R73 R74 R75 R76 R77 R78 R79 R80 R81 R82 R83 R84 R85 R86 R87 R88 R89 R90 R91 R92 R93 R94 R95 R96 R97 R98 R99 R100 R101 R102 R103 R104 R105 R106 R107 R108 R109 R110 R111 R112 R113 R114 R115 R116 R117 R118 R119 R120 R121 R122: library part RES, "Resistor"
RN1 RN2: library part 10X-102, "Resistor network SIL 5 individual resistors, 10 pins"
S1: "DIP Switch Side actuator long liver Piano Key"
SW1 SW2 SW3 SW4 SW5 SW6 SW7: library part B3FS, "SPNA SMD Keyboard Switch"
TP1S TP2S TP3S TP4S TP5S TP6S TP7S TP8S: library part TestPin
U1: "Dual 250mW Audio Amplifier with Shutdown Mode"
U1S: library part SN54LV244W, "Octal Buffer/Driver with 3-State Outputs"
U2: "Dual General-Purpose, Low-Voltage Rail-to-Rail Output Operational Amplifier"
U2S U3S U4S: "5A Low Dropout Positive Regulators"
U3: "Hex Inverter"
U4: library part MAX3232EUE, "3.0V TO 5.5V, Low-Power, up to 1Mbps, True RS-232 Transceiver Using Four 0.1µF External Capacitor"
U5 U6: library part "SRAM 512Kx16 TSOP44", "512Kx16Bit SRAM TSOP44"

## Free pads (board coordinates)
  round 8 / inner round 6.35 / far side round 8 hole 3.175: 0(5.08,5.08) 0(5.08,109.931) 0(159.918,5.08) 0(159.969,109.931)
  round 1 smd far side mask+1.8: FID(14.65,111.2) FID(66.55,48.6) FID(96.55,20.4) FID(138.15,104.9) FID(145.15,6.7)
  round 1 smd mask+2: FID(19.55,109.4)
  round 1 smd mask+1.8: FID(69.35,55) FID(97.45,20.1) FID(138.15,105.2)
  round 5 hole 18.5 unplated: H-SPK2(134.62,73.66) H_SPK1(30.48,73.66)
  round 0.3 hole 0.8 unplated: MB(53.1,115.011) MB(53.1,0) MB(54.2,115.011) MB(54.2,0) MB(55.3,115.011) MB(55.3,0) MB(109.8,115.011) MB(109.8,0) MB(110.9,115.011) MB(110.9,0) MB(112,115.011) MB(112,0)
  round 1.6 on Mech2: PSM(1.75,67) PSM(1.75,68.8) PSM(4.25,93.6) PSM(4.3,86.4) PSM(4.3,97.2) PSM(4.35,90) PSM(4.4,70) PSM(5.3,95.4) PSM(5.35,88.2) PSM(5.35,91.8) PSM(5.4,71.8) PSM(5.4,84.6) PSM(6.3,93.6) PSM(6.35,86.4) PSM(6.35,97.2) PSM(6.4,70) PSM(6.4,90) PSM(7.35,71.8) PSM(7.35,91.8) PSM(7.35,95.4) PSM(7.4,84.6) PSM(7.4,88.2) PSM(8.3,93.6) PSM(8.35,86.4) PSM(8.4,70) PSM(8.4,90) PSM(9.35,71.8) PSM(9.35,91.8) PSM(9.4,84.6) PSM(9.4,88.2) PSM(10.3,93.6) PSM(10.35,86.4) PSM(10.35,90) PSM(10.4,70) PSM(11.35,71.8) PSM(11.4,84.6) PSM(11.4,88.2) PSM(12.35,86.4) PSM(12.4,70) PSM(12.4,90) PSM(13.35,71.8) PSM(13.35,84.6) PSM(13.4,88.2) PSM(14.3,86.4) PSM(14.35,67) PSM(14.35,90) PSM(14.4,70) PSM(15.35,71.8) PSM(15.35,84.6) PSM(15.35,88.2) PSM(16.15,67) PSM(16.35,70) PSM(16.35,86.4) PSM(16.4,90) PSM(17.4,77.4) PSM(17.4,81) PSM(17.4,84.6) PSM(17.4,88.2) PSM(18.35,79.2) PSM(18.35,86.4) PSM(18.4,82.8) PSM(18.4,90) PSM(19.4,81) PSM(19.4,84.6) PSM(19.4,88.2) PSM(20.35,82.8) PSM(20.35,86.4) PSM(20.35,90) PSM(21.35,88.2) PSM(21.4,84.6) PSM(22.35,86.4) PSM(22.35,90) PSM(23.35,88.2) PSM(24.35,86.4) PSM(24.35,90) PSM(26.2,87.1) PSM(28.2,87.1) PSM(30.2,87.1) PSM(121.35,52.4) PSM(122.35,47) PSM(122.35,50.6) PSM(122.35,54.2) PSM(123.35,48.8) PSM(123.35,52.4) PSM(124.35,40.3) PSM(124.35,47) PSM(124.35,50.6) PSM(124.35,54.2) PSM(125.35,31.2) PSM(125.35,38.4) PSM(125.35,45.2) PSM(125.35,48.8) PSM(125.35,52.4) PSM(126.35,33) PSM(126.35,36.6) PSM(126.35,40.3) PSM(126.35,43.4) PSM(126.35,47) PSM(126.35,50.6) PSM(126.35,54.2) PSM(127.35,31.2) PSM(127.35,34.8) PSM(127.35,38.4) PSM(127.35,45.2) PSM(127.35,48.8) PSM(127.35,52.4) PSM(128.35,33) PSM(128.35,36.6) PSM(128.35,40.3) PSM(128.35,43.4) PSM(128.35,47) PSM(128.35,50.6) PSM(128.35,54.2) PSM(129.35,31.2) PSM(129.35,34.8) PSM(129.35,38.4) PSM(129.35,45.2) PSM(129.35,48.8) PSM(129.35,52.4) PSM(130.35,29.4) PSM(130.35,33) PSM(130.35,36.6) PSM(130.35,40.3) PSM(130.35,43.4) PSM(130.35,47) PSM(130.35,50.6) PSM(130.35,54.2) PSM(131.35,16.8) PSM(131.35,20.4) PSM(131.35,24) PSM(131.35,27.6) PSM(131.35,31.2) PSM(131.35,34.8) PSM(131.35,38.4) PSM(131.35,45.2) PSM(131.35,48.8) PSM(131.35,52.4) PSM(132.35,18.6) PSM(132.35,22.2) PSM(132.35,25.8) PSM(132.35,29.4) PSM(132.35,33) PSM(132.35,36.6) PSM(132.35,40.3) PSM(133.35,16.8) PSM(133.35,34.8) PSM(133.35,38.4) PSM(134.35,18.6) PSM(134.35,33) PSM(134.35,36.6) PSM(134.35,40.3) PSM(135.35,16.8) PSM(135.35,34.8) PSM(135.35,38.4) PSM(136.35,15) PSM(136.35,18.6) PSM(136.35,33) PSM(136.35,36.6) PSM(136.35,40.3) PSM(137.35,13.2) PSM(137.35,16.8) PSM(137.35,34.8) PSM(137.35,38.4) PSM(138.35,15) PSM(138.35,18.6) PSM(138.35,33) PSM(138.35,36.6) PSM(138.35,40.3) PSM(139.35,16.8) PSM(139.35,13.2) PSM(139.35,34.8) PSM(139.35,38.4) PSM(140.35,18.6) PSM(140.35,15) PSM(140.35,33) PSM(140.35,36.6) PSM(140.35,40.3) PSM(141.35,16.8) PSM(141.35,34.8) PSM(141.35,38.4) PSM(141.35,13.2) PSM(142.35,15) PSM(142.35,18.6) PSM(142.35,33) PSM(142.35,36.6) PSM(142.35,40.3) PSM(143.35,13.2) PSM(143.35,16.8) PSM(143.35,34.8) PSM(143.35,38.4) PSM(144.35,15) PSM(144.35,18.6) PSM(144.35,33) PSM(144.35,36.6) PSM(144.35,40.3) PSM(145.35,13.2) PSM(145.35,20.4) PSM(145.35,31.2) PSM(145.35,16.8) PSM(145.35,34.8) PSM(145.35,38.4) PSM(146.35,33) PSM(146.35,36.6) PSM(146.35,40.3) PSM(146.35,18.6) PSM(147.35,16.8) PSM(147.35,20.4) PSM(147.35,34.8) PSM(147.35,38.4) PSM(148.35,36.6) PSM(148.35,40.3) PSM(148.35,18.6) PSM(149.35,16.8) PSM(149.35,34.8) PSM(149.35,38.4) PSM(149.35,16.8) PSM(149.35,20.4) PSM(150.35,36.6) PSM(150.35,40.3) PSM(150.35,18.6) PSM(151.35,38.4) PSM(151.35,16.8) PSM(152.35,15) PSM(158.75,32)
  rect 1.7x1.7 on Mech2: PSM(29.21,58.42) PSM(133.35,58.42)
  round 20.5 on Mech2: PSM(30.48,73.66) PSM(134.62,73.66)
  round 1.7 on Mech2: PSM(31.75,58.42) PSM(135.89,58.42)

## Via types
v1: diameter 0.6, hole 0.3, Top Layer to Bottom Layer, tented both sides, 427 vias
v2: diameter 1.6, hole 1, Top Layer to Bottom Layer, 224 vias
v3: diameter 0.9, hole 0.5, Top Layer to Bottom Layer, tented both sides, 126 vias
v4: diameter 1.27, hole 0.711, Top Layer to Bottom Layer, tented both sides, 2 vias

## Nets (pads, with @x,y where several pads share a name; then routed paths per layer and width w, separated by ;. In a path a pad name is that pad's centre, name@x,y a point inside that pad or via, vN(x,y) a via of type N, cw(c..) or ccw(c..) an arc to the next point about the centre after c; other vN are vias at no path point)
5VFILT: C3.1 R6.1 R7.1 U2.8 | length 31
  Top Layer w0.6: R6.1@4.35,39.45 4.35,38.2 3.75,37.6 2.15,37.6 1.35,36.8 1.35,27.8 2.35,26.8 9.15,26.8 9.55,26.4 C3.1@9.55,25 ; R7.1@5.75,24.95 9.5,24.95 C3.1@9.55,25 ; C3.1@9.55,24.8 C3.1@9.55,25 ; U2.8@12.55,25 C3.1@9.55,25